# Altium PCB Backplane_Breakout_Adapter.PcbDoc
Units mil, origin at the board's own origin, x right, y up, seen from the top; angles counter-clockwise.
Board outline 4000 x 4000 mil, 2 copper layers (Top Layer, Bottom Layer); 50 components, 57 nets, 309 pads, 193 vias.
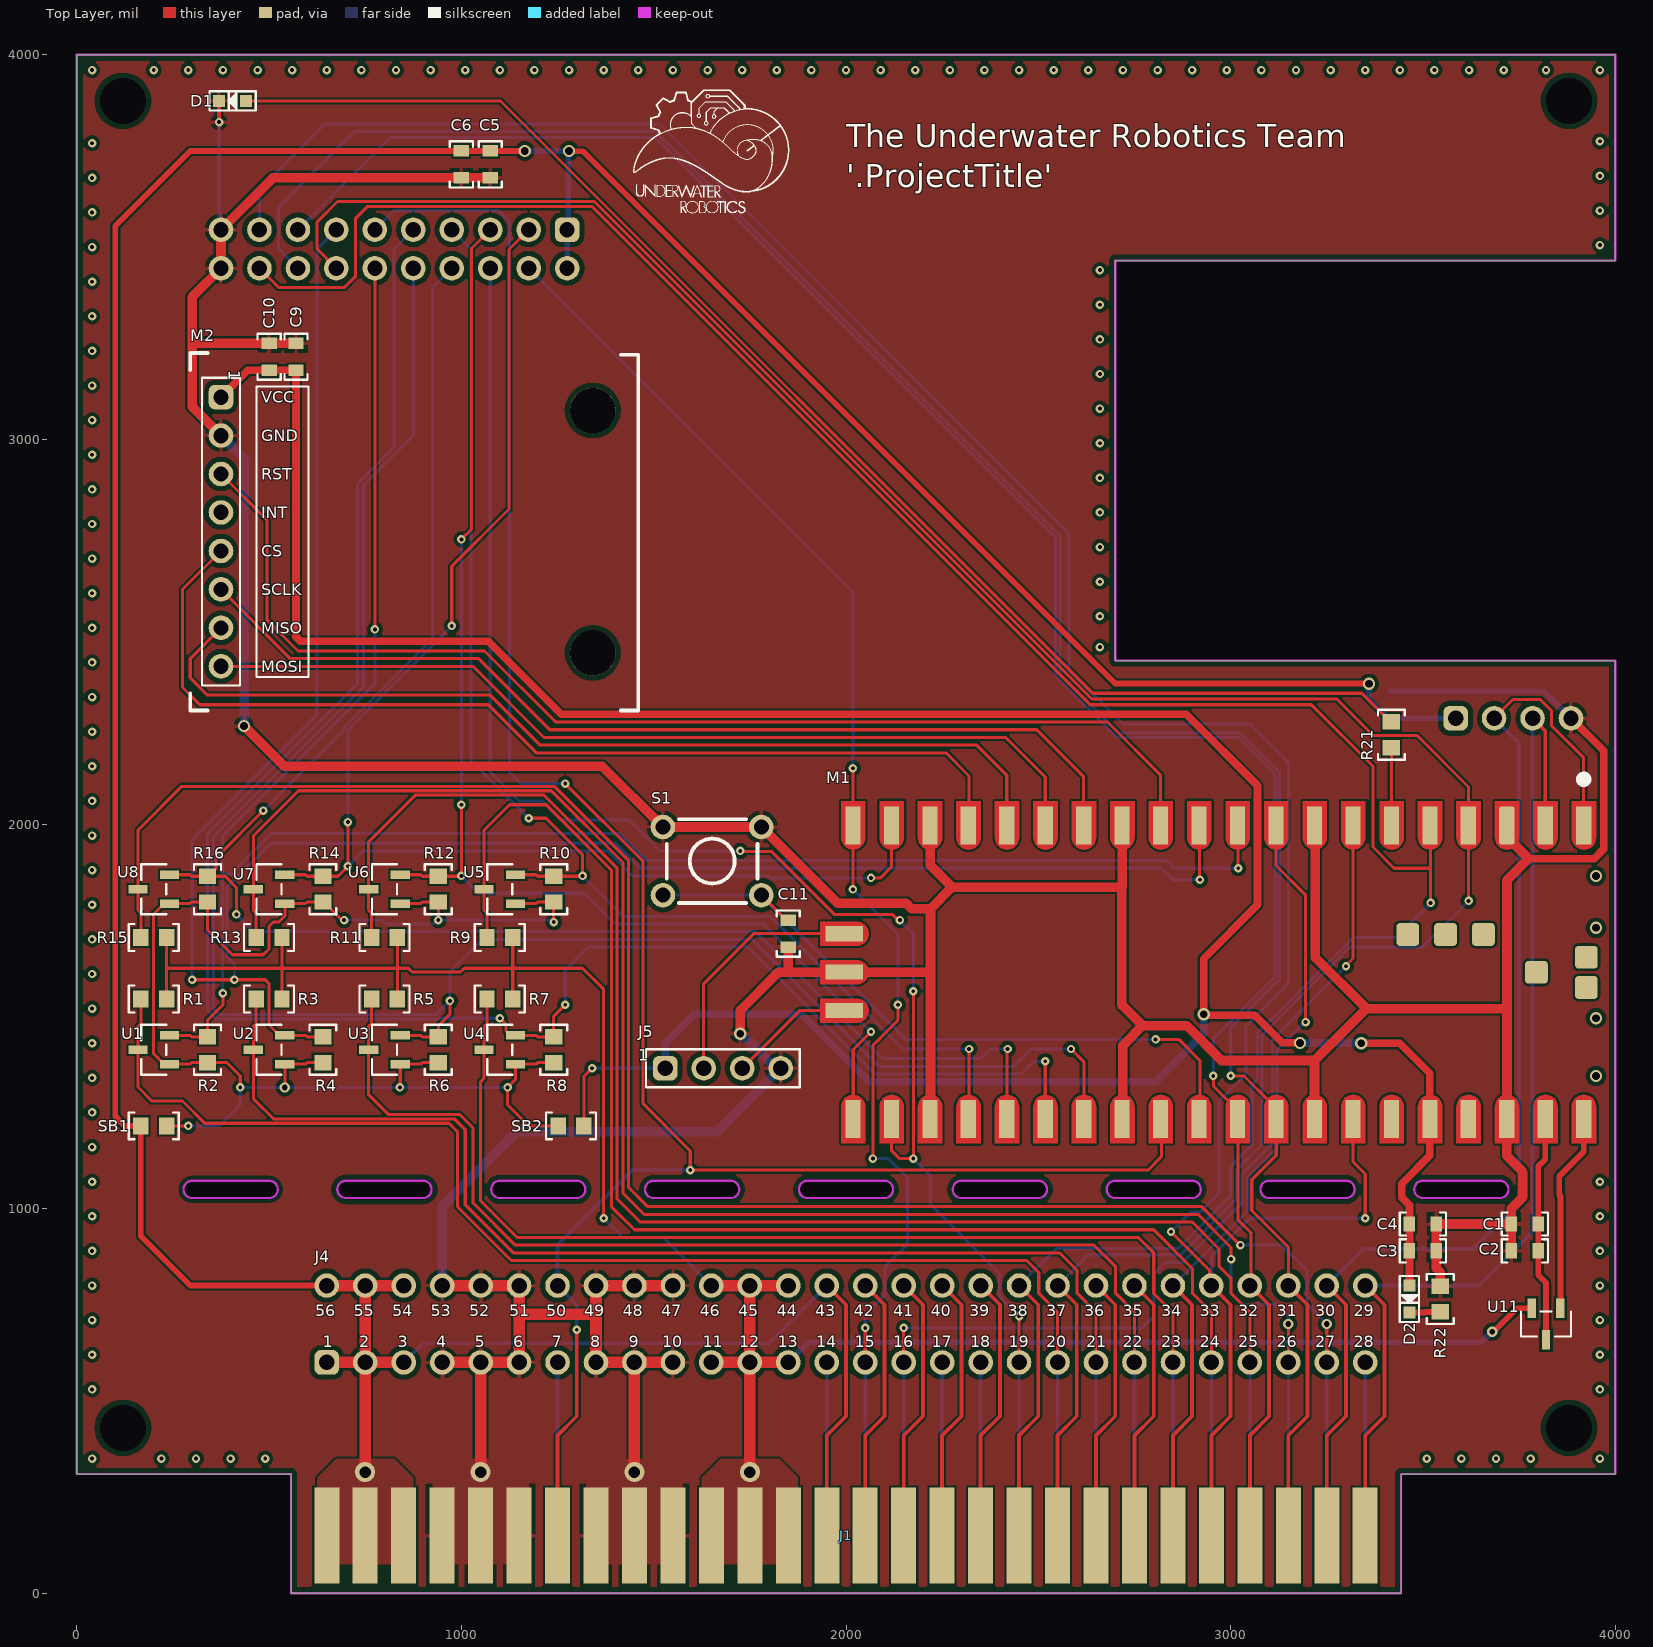
[diagram p0: Top Layer view]
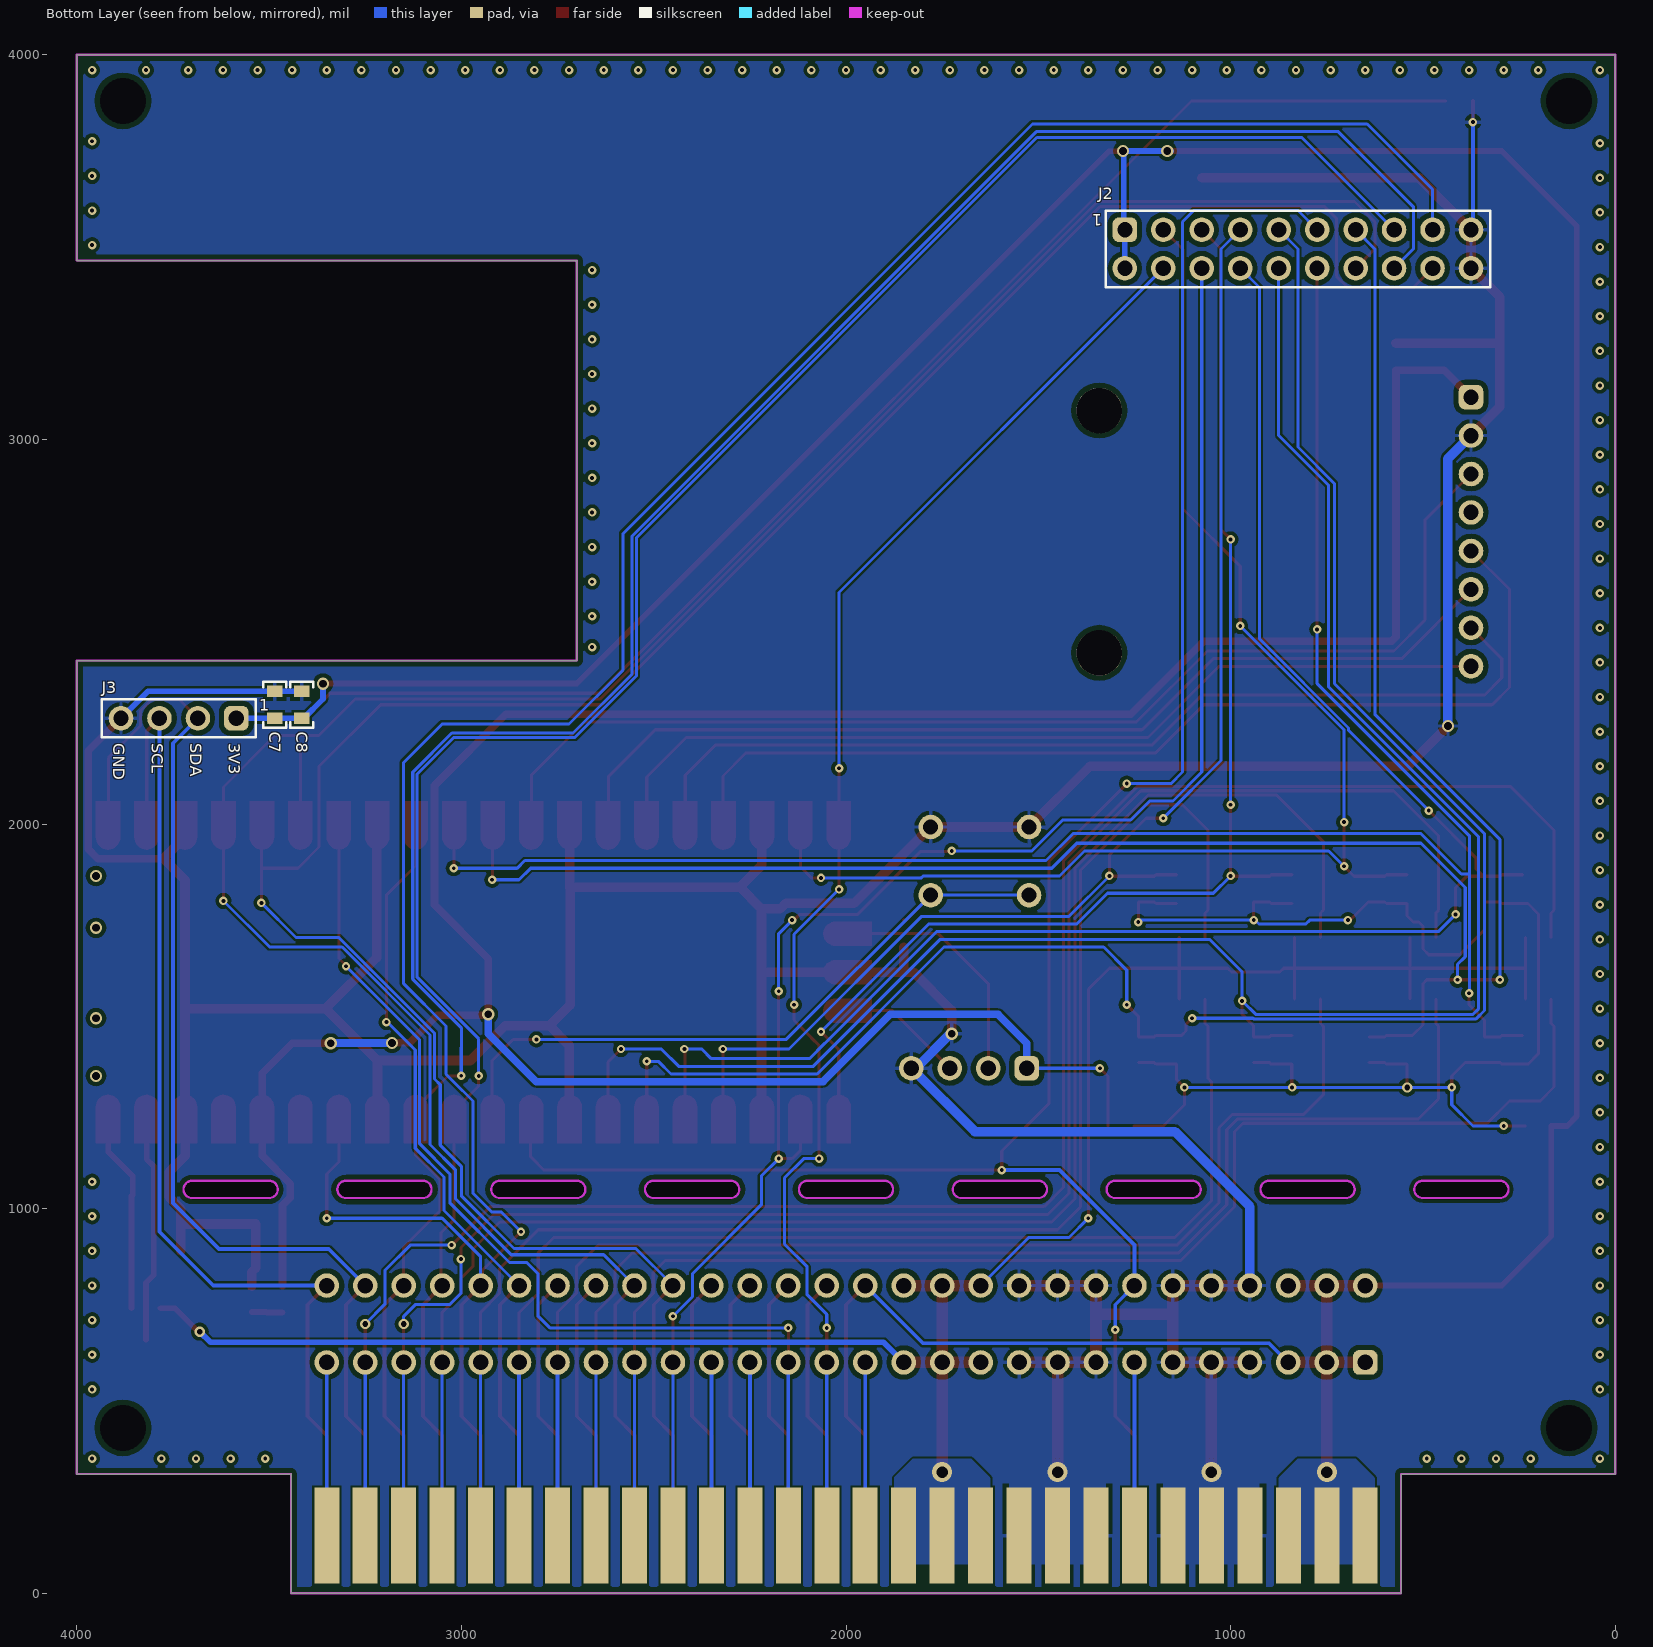
[diagram p1: Bottom Layer view, seen from below]
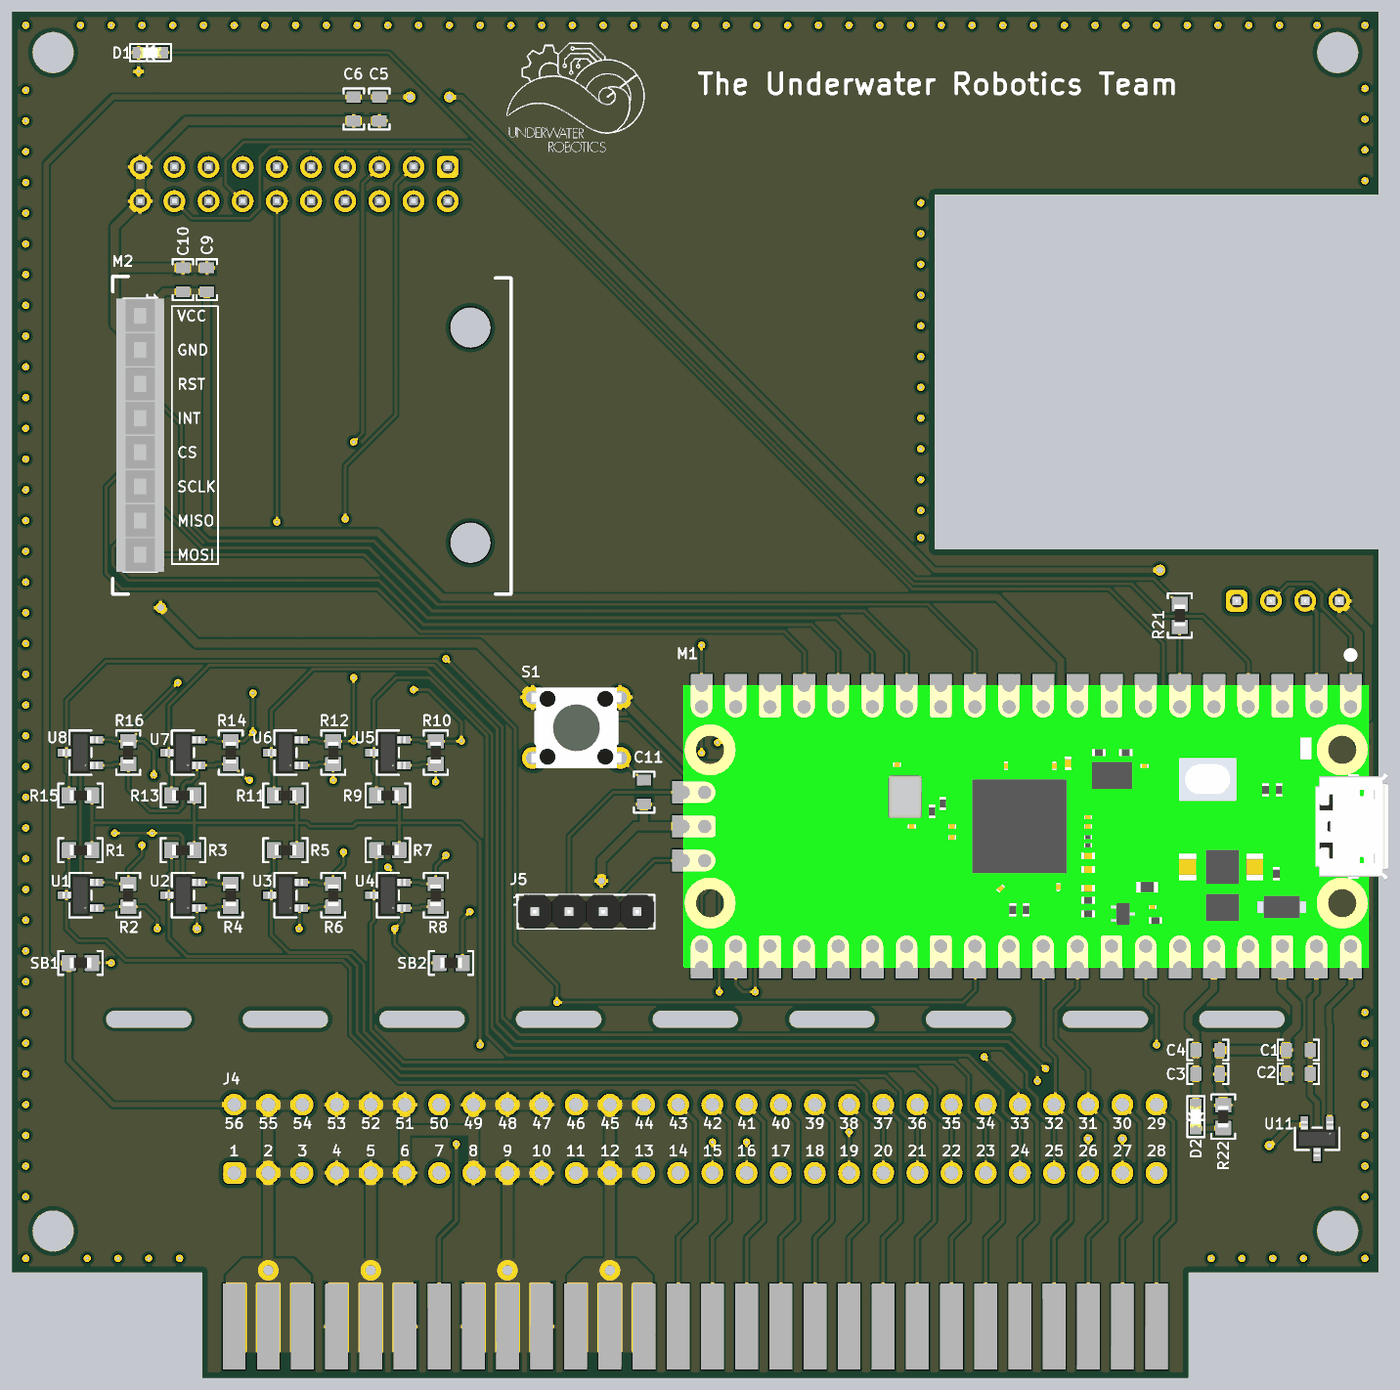
[diagram p2: 3D render of the assembled board from above, using the file's embedded part models]
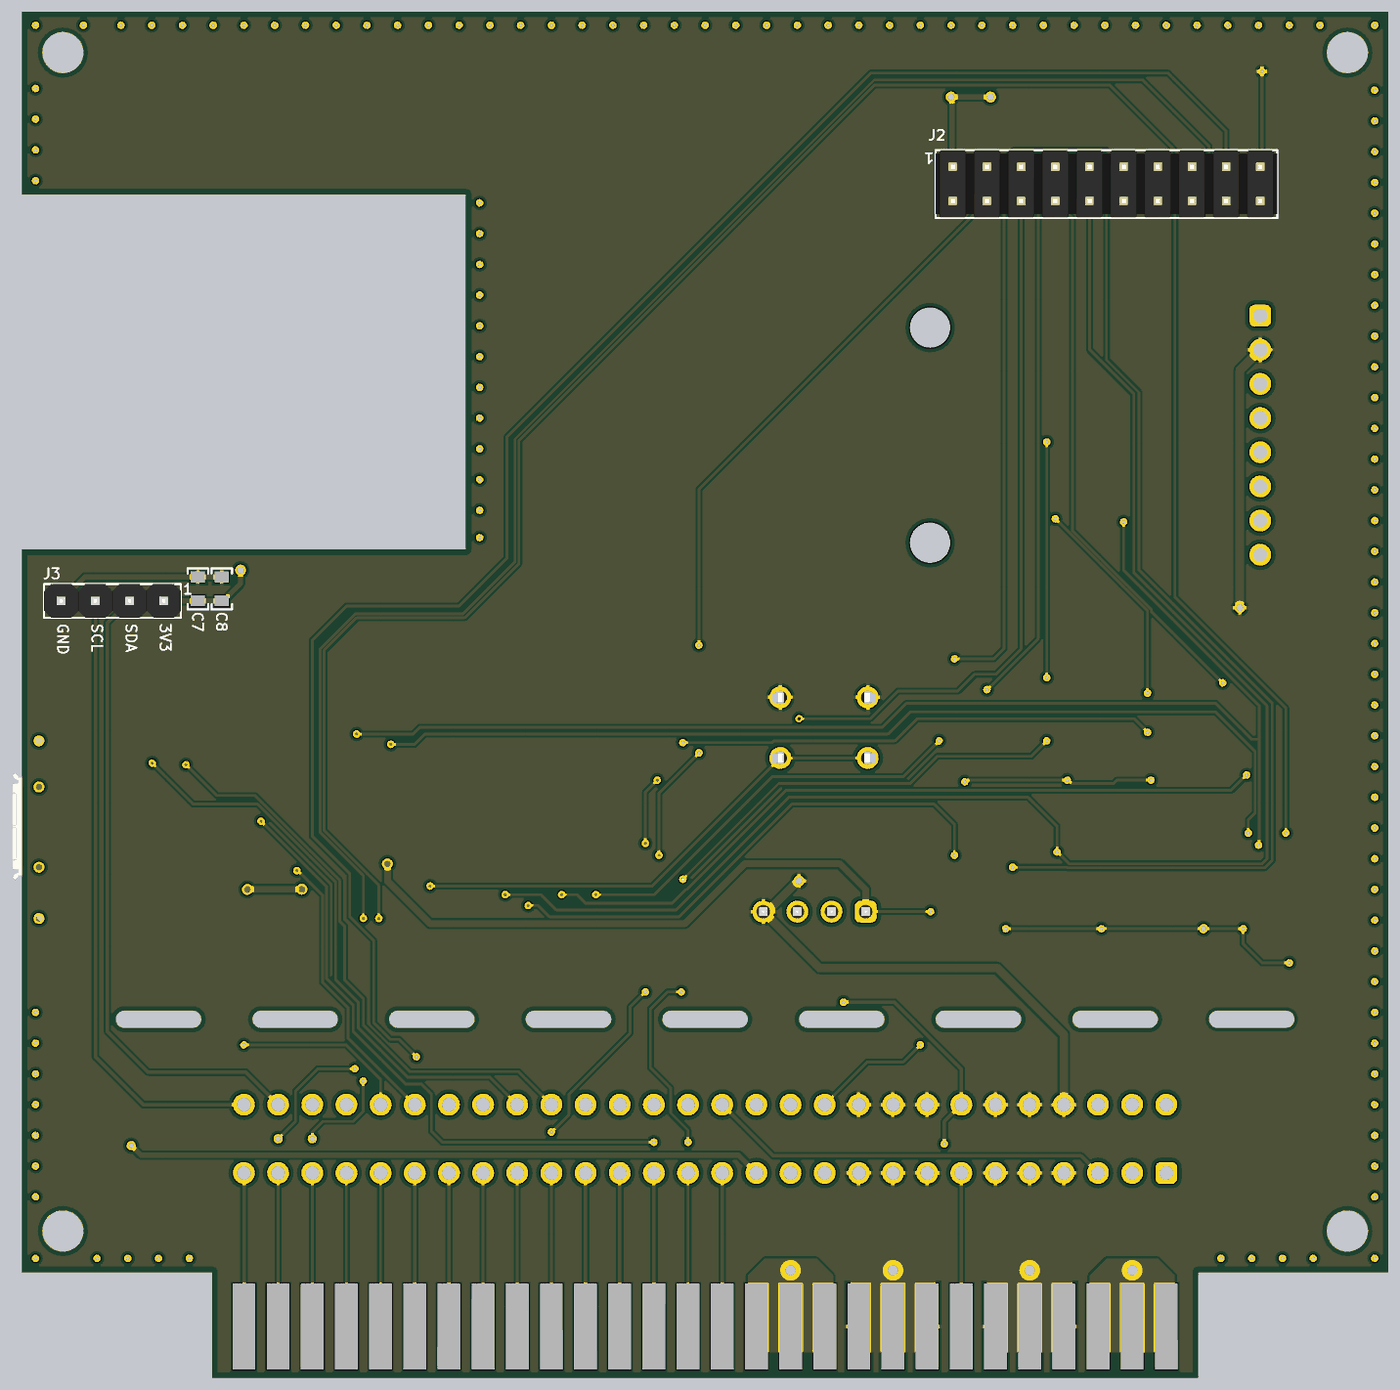
[diagram p3: 3D render of the assembled board from below, using the file's embedded part models]

## Layer stack, top to bottom
Top Solder: solder mask 0.4, Solder Resist, Dk 3.5
Top Layer: signal copper 1.4
Dielectric 1: dielectric 12.6, FR-4, Dk 4.8
Bottom Layer: signal copper 1.4
Bottom Solder: solder mask 0.4, Solder Resist, Dk 3.5

## Board outline
557,0 557,310 0,310 0,4000 4000,4000 4000,3465 2700,3465 2700,2425 4000,2425 4000,310 3443,310 3443,0

## Design rules (kind name [scope] priority, off if disabled: settings)
AcuteAngle [All] p1: minimum=8.75000000000000E+0001 checktracksonly=FALSE
BoardOutlineClearance [All] p1: gap=16 ignorepadtopadclearanceinfootprint=FALSE
Clearance "Clearance JLCPCB" [All] p1: gap=6 ignorepadtopadclearanceinfootprint=FALSE except(3.5: Arc-Arc Arc-Track Track-Track; 5: Arc-SMDPad Track-SMDPad SMDPad-SMDPad; 10: Arc-Via Arc-Hole Track-Via Track-Hole Via-Via Via-Fill Via-Poly Via-Region Fill-Hole Poly-Hole Region-Hole; 12.99: Arc-THPad Track-THPad; 13: THPad-Fill THPad-Poly THPad-Region; 20: THPad-THPad)
ComponentOrientations [All] p1: allowedrotations=32
DiffPairsRouting "USB 2.0" [InDifferentialPairClass('USB 2.0')] p1: maxlimit=4 minlimit=4 mostfreqgap=4 toplayer_minwidth=9 toplayer_maxwidth=9 toplayer_prefwidth=9 bottomlayer_minwidth=9 bottomlayer_maxwidth=9 bottomlayer_prefwidth=9 impedanceprofiledriven=TRUE impedanceprofileid={B279FAB8-9179-4BDF-8125-EF1A8961339F} maxuncoupledlength=500
DiffPairsRouting [All] p2: maxlimit=10 minlimit=10 mostfreqgap=10 toplayer_minwidth=15 toplayer_maxwidth=15 toplayer_prefwidth=15 bottomlayer_minwidth=15 bottomlayer_maxwidth=15 bottomlayer_prefwidth=15 maxuncoupledlength=500
FanoutControl Fanout_Default [All] p5: bgadir=Out bgaviamode=Centered fanoutstyle=Auto fanoutdirection=OutOnly viagrid=1 // Fanout_Default (Default Rule)
HoleSize "HoleSize JLCPCB" [All] p1: absolutevalues=TRUE maxlimit=245 minlimit=8 maxpercent=80.000 minpercent=20.000
HoleToHoleClearance "HoleToHoleClearance JLCPCB" [All] p1: gap=20 allowstackedmicrovias=TRUE
MinimumAnnularRing "MinimumAnnularRing JLCPCB" [All] p1: minimumring=6
MinimumSolderMaskSliver [All] p1 off: minsoldermaskwidth=10
PasteMaskExpansion [All] p1: expansion=1
PolygonConnect EdgeConnect [(IsNamedPolygon('PolygonDirect'))] p1: connectstyle=Direct reliefconductorwidth=10 reliefentries=4 polygonreliefangle="90 Angle" airgapwidth=10
PolygonConnect [All] p2: connectstyle=Relief reliefconductorwidth=10 reliefentries=4 polygonreliefangle="90 Angle" airgapwidth=10
RoutingVias "RoutingVias JLCPCB" [All] p1: holewidth=10 width=22 viastyle="Through Hole" minholewidth=8 minwidth=20 maxholewidth=28 maxwidth=40
SMDEntry [All] p1: side=TRUE corner=TRUE anyangle=FALSE
SMDToCorner [All] p1: distance=0
SMDToPlane [All] p1: distance=0
SilkToSilkClearance [All] p1: silktosilkclearance=1
SilkToSolderMaskClearance "SilkToSolderMaskClearance JLCPCB" [IsPad] p1: minsilkscreentomaskgap=6 clearancetoexposedcopper=TRUE
SolderMaskExpansion [All] p1: expansion=4 istentingtop=FALSE
UnRoutedNet [All] p1: checkbadconnections=TRUE
Width "Width JLCPCB 1oz" [All] p1: maxlimit=100 minlimit=5 preferedwidth=8 minimp=50.000000 maximp=50.000000 favimp=50.000000
21 further rules are at their usual default settings.

## Classes and differential pairs
component class Backplane_Breakout_Adapter_Pico: C1 C2 C3 C4 C9 C10 C11 D1 D2 J5 M1 M2 R21 R22 S1 U11
component class Backplane_Breakout_Adapter_Connectors: C5 C6 C7 C8 J1 J2 J3 J4 R1 R2 R3 R4 R5 R6 R7 R8 R9 R10 R11 R12 R13 R14 R15 R16 SB1 SB2 U1 U2 U3 U4 U5 U6 U7 U8

## Components (designator, comment, footprint, x,y, rotation, side; value= is the part's Value field where it differs from the comment)
C1 "1uF Ceramic 16V" CAPACITOR_0603 3765,960 r180 top value=1uF
C2 "10uF Ceramic 6.3V" CAPACITOR_0603 3765,890 r180 top
C3 "1uF Ceramic 16V" CAPACITOR_0603 3500,890 r0 top value=1uF
C4 "10uF Ceramic 6.3V" CAPACITOR_0603 3500,960 r0 top
C5 "100nF Ceramic 6.3V" CAPACITOR_0603 1075,3715 r270 top value=0.1uF
C6 "1uF Ceramic 16V" CAPACITOR_0603 1000,3715 r270 top value=1uF
C7 "100nF Ceramic 6.3V" CAPACITOR_0603 3485,2310 r90 bottom value=0.1uF
C8 "1uF Ceramic 16V" CAPACITOR_0603 3415,2310 r90 bottom value=1uF
C9 "1uF Ceramic 16V" CAPACITOR_0603 570,3215 r90 top value=1uF
C10 "100nF Ceramic 6.3V" CAPACITOR_0603 500,3215 r90 top value=0.1uF
C11 "10nF Ceramic 6.3V" CAPACITOR_0603 1850,1715 r270 top value=0.01uF
D1 "150060RS75000" LED_0603 405,3880 r180 top
D2 "150060GS75000" LED_0603 3465,765 r270 top
J1 "Backplane Connector" BACKPLANE_EDGE_CONN 650,150 r0 top locked
J2 "RP2040 GPIO Header" HEADER_MIRRORED_2x10PIN_2.54MM 1275,3545 r0 bottom locked
J3 "CONN HEADER VERT 4POS 2.54MM" HEADER_MIRRORED_4PIN_2.54MM 3585,2275 r180 bottom locked
J4 "Backplane Breakout Pins" HEADER_2X28PIN_2.54MM 650,600 r0 top locked
J5 "CONN HEADER VERT 4POS 2.54MM" HEADER_4PIN_2.54MM 1530,1365 r0 top locked
M1 "RPI-PICO" RPI-PICO-MOD 2956.8,1614.76 r270 top locked
M2 "W5x00 Breakout Board" W5500IO-P 375,3110 r270 top locked
R1 "10k Ohm 5% 1/10W" RESISTOR_0603 200,1545 r180 top
R2 "10k Ohm 5% 1/10W" RESISTOR_0603 340,1413.08 r270 top
R3 "10k Ohm 5% 1/10W" RESISTOR_0603 500,1545 r180 top
R4 "10k Ohm 5% 1/10W" RESISTOR_0603 640,1413.08 r270 top
R5 "10k Ohm 5% 1/10W" RESISTOR_0603 800,1545 r180 top
R6 "10k Ohm 5% 1/10W" RESISTOR_0603 940,1413.08 r270 top
R7 "10k Ohm 5% 1/10W" RESISTOR_0603 1100,1545 r180 top
R8 "10k Ohm 5% 1/10W" RESISTOR_0603 1240,1413.08 r270 top
R9 "10k Ohm 5% 1/10W" RESISTOR_0603 1100,1705 r180 top
R10 "10k Ohm 5% 1/10W" RESISTOR_0603 1240,1830.58 r270 top
R11 "10k Ohm 5% 1/10W" RESISTOR_0603 800,1705 r180 top
R12 "10k Ohm 5% 1/10W" RESISTOR_0603 940,1830.58 r270 top
R13 "10k Ohm 5% 1/10W" RESISTOR_0603 500,1705 r180 top
R14 "10k Ohm 5% 1/10W" RESISTOR_0603 640,1830.58 r270 top
R15 "10k Ohm 5% 1/10W" RESISTOR_0603 200,1705 r180 top
R16 "10k Ohm 5% 1/10W" RESISTOR_0603 340,1830.58 r270 top
R21 "62 Ohm 1% 1/4W" RESISTOR_0603 3418.02,2231.98 r270 top
R22 "27 Ohm 5% 1/8W" RESISTOR_0603 3545,765 r270 top
S1 "SPST Tactile Switch" TactileSwitch 1780,1815 r180 top locked
SB1 "0 Ohm Jumper No Fit" RESISTOR_0603 200,1215 r180 top
SB2 "0 Ohm Jumper No Fit" RESISTOR_0603 1285,1215 r180 top
U1 "AO3404A" SOT-23-3 200,1413.08 r90 top
U2 "AO3404A" SOT-23-3 500,1413.08 r90 top
U3 "AO3404A" SOT-23-3 800,1413.08 r90 top
U4 "AO3404A" SOT-23-3 1100,1413.08 r90 top
U5 "AO3404A" SOT-23-3 1100,1830.58 r90 top
U6 "AO3404A" SOT-23-3 800,1830.58 r90 top
U7 "AO3404A" SOT-23-3 500,1830.58 r90 top
U8 "AO3404A" SOT-23-3 200,1830.58 r90 top
U11 "MOSFET P-CHANNEL 20V 4.7A SOT23" SOT-23-3 3820,700 r180 top

## Footprints (in the part's own frame and the unit in brackets; to place one, negate y for a bottom-side part, rotate by r counter-clockwise, add the part's x,y. Pads: shape width x height; smd on the part's side, far side on the other; paste and mask are expansions set on the pad)
BACKPLANE_EDGE_CONN [mil]
  rect 65x250 smd far side: 1(0,0) 2(100,0) 3(200,0) 4(300,0) 5(400,0) 6(500,0) 7(600,0) 8(700,0) 9(800,0) 10(900,0) 11(1000,0) 12(1100,0) 13(1200,0) 14(1300,0) 15(1400,0) 16(1500,0) 17(1600,0) 18(1700,0) 19(1800,0) 20(1900,0) 21(2000,0) 22(2100,0) 23(2200,0) 24(2300,0) 25(2400,0) 26(2500,0) 27(2600,0) 28(2700,0)
  rect 65x250 smd: 29(2700,0) 30(2600,0) 31(2500,0) 32(2400,0) 33(2300,0) 34(2200,0) 35(2100,0) 36(2000,0) 37(1900,0) 38(1800,0) 39(1700,0) 40(1600,0) 41(1500,0) 42(1400,0) 43(1300,0) 44(1200,0) 45(1100,0) 46(1000,0) 47(900,0) 48(800,0) 49(700,0) 50(600,0) 51(500,0) 52(400,0) 53(300,0) 54(200,0) 55(100,0) 56(0,0)
CAPACITOR_0603 [mil] "CAPACITOR 0603"
  rect 30x40 smd: 1(-35,0) 2(35,0)
  silkscreen extent -60,-30 60,30, body extent -31,-16 32,16, height 31
HEADER_2X28PIN_2.54MM [mm]
  rrect50% 1.62x1.62 hole 1.02: 1(0,0)
  round 1.62 hole 1.02: 2(2.54,0) 3(5.08,0) 4(7.62,0) 5(10.16,0) 6(12.7,0) 7(15.24,0) 8(17.78,0) 9(20.32,0) 10(22.86,0) 11(25.4,0) 12(27.94,0) 13(30.48,0) 14(33.02,0) 15(35.56,0) 16(38.1,0) 17(40.64,0) 18(43.18,0) 19(45.72,0) 20(48.26,0) 21(50.8,0) 22(53.34,0) 23(55.88,0) 24(58.42,0) 25(60.96,0) 26(63.5,0) 27(66.04,0) 28(68.58,0) 29(68.58,5.08) 30(66.04,5.08) 31(63.5,5.08) 32(60.96,5.08) 33(58.42,5.08) 34(55.88,5.08) 35(53.34,5.08) 36(50.8,5.08) 37(48.26,5.08) 38(45.72,5.08) 39(43.18,5.08) 40(40.64,5.08) 41(38.1,5.08) 42(35.56,5.08) 43(33.02,5.08) 44(30.48,5.08) 45(27.94,5.08) 46(25.4,5.08) 47(22.86,5.08) 48(20.32,5.08) 49(17.78,5.08) 50(15.24,5.08) 51(12.7,5.08) 52(10.16,5.08) 53(7.62,5.08) 54(5.08,5.08) 55(2.54,5.08) 56(0,5.08)
HEADER_4PIN_2.54MM [mm]
  rrect50% 1.62x1.62 hole 1.02: 1(0,0)
  round 1.62 hole 1.02: 2(2.54,0) 3(5.08,0) 4(7.62,0)
  silkscreen extent -1.27,-1.25 8.89,1.25, body extent -1.27,-1.27 8.89,1.27, height 10.48
HEADER_MIRRORED_2x10PIN_2.54MM [mm]
  rrect50% 1.62x1.62 hole 1: 1(0,0)
  round 1.62 hole 1: 2(0,2.54) 3(-2.54,0) 4(-2.54,2.54) 5(-5.08,0) 6(-5.08,2.54) 7(-7.62,0) 8(-7.62,2.54) 9(-10.16,0) 10(-10.16,2.54) 11(-12.7,0) 12(-12.7,2.54)
  round 1.62 hole 1.02: 13(-15.24,0) 14(-15.24,2.54) 15(-17.78,0) 16(-17.78,2.54) 17(-20.32,0) 18(-20.32,2.54) 19(-22.86,0) 20(-22.86,2.54)
  silkscreen extent -24.13,-1.25 1.27,3.79, body extent -24.13,-1.25 1.27,3.75, height 7.01
HEADER_MIRRORED_4PIN_2.54MM [mm]
  rrect50% 1.62x1.62 hole 1.02: 1(0,0)
  round 1.62 hole 1.02: 2(-2.54,0) 3(-5.08,0) 4(-7.62,0)
  silkscreen extent -8.89,-1.25 1.27,1.25, body extent -8.89,-1.27 1.27,1.27, height 10.48
LED_0603 [mil] "LED 0603"
  rect 32x32 smd: 1(-35,0) 2(35,0)
  silkscreen extent -60,-25 60,25, body extent -31,-16 32,16, height 28
RESISTOR_0603 [mil] "Resistor 0603"
  rect 40x45 smd: 1(-33.5,0) 2(33.5,0)
  silkscreen extent -65,-35 65,35, body extent -31,-16 32,16, height 16
RPI-PICO-MOD [mm] "RASPBERRY PI PICO RP2040 BOARD"
  rect 2.5x1 smd mask+0.102: 1(-9.69,24.415) 2(-9.69,21.875) 4(-9.69,16.795) 5(-9.69,14.255) 6(-9.69,11.715) 7(-9.69,9.175) 8(-9.69,6.635) 9(-9.69,4.095) 10(-9.69,1.555) 11(-9.69,-0.985) 12(-9.69,-3.525) 13(-9.69,-6.065) 14(-9.69,-8.605) 15(-9.69,-11.145) 16(-9.69,-13.685) 17(-9.69,-16.225) 18(-9.69,-18.765) 19(-9.69,-21.305) 20(-9.69,-23.845)
  rrect25% 2.5x1 smd mask+0.102: 3(-9.69,19.335)
  rect 2.5x1 smd: 21(9.69,-23.845) 22(9.69,-21.305) 23(9.69,-18.765) 24(9.69,-16.225) 25(9.69,-13.685) 26(9.69,-11.145) 27(9.69,-8.605) 28(9.69,-6.065) 29(9.69,-3.525) 30(9.69,-0.985) 31(9.69,1.555) 32(9.69,4.095) 33(9.69,6.635) 34(9.69,9.175) 35(9.69,11.715) 36(9.69,14.255) 37(9.69,16.795) 38(9.69,19.335) 39(9.69,21.875) 40(9.69,24.415)
  rect 1x2.5 smd: 41(-2.54,-24.415) 42(0,-24.415) 43(2.54,-24.415)
  rrect30% 1.5x1.5 smd: 44(0.01,21.292) 45(1.01,24.592) 46(-0.99,24.592) 47(-2.49,17.792) 48(-2.49,15.292) 49(-2.49,12.792)
  Top Layer region: -1.74,-25.999 -3.34,-25.999 -3.34,-23.599 -3.34,-23.599 -3.261,-23.252 -3.039,-22.974 -2.718,-22.819 -2.362,-22.819 -2.041,-22.974 -1.819,-23.252 -1.74,-23.599 -1.74,-23.599
  Top Layer region: 0.8,-25.999 -0.8,-25.999 -0.8,-23.599 -0.8,-23.599 -0.721,-23.252 -0.499,-22.974 -0.178,-22.819 0.178,-22.819 0.499,-22.974 0.721,-23.252 0.8,-23.599 0.8,-23.599
  Top Layer region: 3.34,-25.999 1.74,-25.999 1.74,-23.599 1.74,-23.599 1.819,-23.252 2.041,-22.974 2.362,-22.819 2.718,-22.819 3.039,-22.974 3.261,-23.252 3.34,-23.599 3.34,-23.599
  Top Layer region: -11.292,-24.629 -11.292,-23.029 -8.892,-23.029 -8.892,-23.029 -8.545,-23.108 -8.267,-23.33 -8.112,-23.651 -8.112,-24.007 -8.267,-24.328 -8.545,-24.55 -8.892,-24.629 -8.892,-24.629
  Top Layer region: -11.292,-22.089 -11.292,-20.489 -8.892,-20.489 -8.892,-20.489 -8.545,-20.568 -8.267,-20.79 -8.112,-21.111 -8.112,-21.467 -8.267,-21.788 -8.545,-22.01 -8.892,-22.089 -8.892,-22.089
  Top Layer region: -11.292,-19.549 -11.292,-17.949 -8.892,-17.949 -8.892,-17.949 -8.545,-18.028 -8.267,-18.25 -8.112,-18.571 -8.112,-18.927 -8.267,-19.248 -8.545,-19.47 -8.892,-19.549 -8.892,-19.549
  Top Layer region: -11.292,-17.009 -11.292,-15.409 -8.892,-15.409 -8.892,-15.409 -8.545,-15.488 -8.267,-15.71 -8.112,-16.031 -8.112,-16.387 -8.267,-16.708 -8.545,-16.93 -8.892,-17.009 -8.892,-17.009
  Top Layer region: -11.292,-14.469 -11.292,-12.869 -8.892,-12.869 -8.892,-12.869 -8.545,-12.948 -8.267,-13.17 -8.112,-13.491 -8.112,-13.847 -8.267,-14.168 -8.545,-14.39 -8.892,-14.469 -8.892,-14.469
  Top Layer region: -11.292,-11.929 -11.292,-10.329 -8.892,-10.329 -8.892,-10.329 -8.545,-10.408 -8.267,-10.63 -8.112,-10.951 -8.112,-11.307 -8.267,-11.628 -8.545,-11.85 -8.892,-11.929 -8.892,-11.929
  Top Layer region: -11.292,-9.389 -11.292,-7.789 -8.892,-7.789 -8.892,-7.789 -8.545,-7.868 -8.267,-8.09 -8.112,-8.411 -8.112,-8.767 -8.267,-9.088 -8.545,-9.31 -8.892,-9.389 -8.892,-9.389
  Top Layer region: -11.292,-6.849 -11.292,-5.249 -8.892,-5.249 -8.892,-5.249 -8.545,-5.328 -8.267,-5.55 -8.112,-5.871 -8.112,-6.227 -8.267,-6.548 -8.545,-6.77 -8.892,-6.849 -8.892,-6.849
  Top Layer region: -11.292,-4.309 -11.292,-2.709 -8.892,-2.709 -8.892,-2.709 -8.545,-2.788 -8.267,-3.01 -8.112,-3.331 -8.112,-3.687 -8.267,-4.008 -8.545,-4.23 -8.892,-4.309 -8.892,-4.309
  Top Layer region: -11.292,-1.769 -11.292,-0.169 -8.892,-0.169 -8.892,-0.169 -8.545,-0.248 -8.267,-0.47 -8.112,-0.791 -8.112,-1.147 -8.267,-1.468 -8.545,-1.69 -8.892,-1.769 -8.892,-1.769
  Top Layer region: -11.292,0.771 -11.292,2.371 -8.892,2.371 -8.892,2.371 -8.545,2.292 -8.267,2.07 -8.112,1.749 -8.112,1.393 -8.267,1.072 -8.545,0.85 -8.892,0.771 -8.892,0.771
  Top Layer region: -11.292,3.311 -11.292,4.911 -8.892,4.911 -8.892,4.911 -8.545,4.832 -8.267,4.61 -8.112,4.289 -8.112,3.933 -8.267,3.612 -8.545,3.39 -8.892,3.311 -8.892,3.311
  Top Layer region: -11.292,5.851 -11.292,7.451 -8.892,7.451 -8.892,7.451 -8.545,7.372 -8.267,7.15 -8.112,6.829 -8.112,6.473 -8.267,6.152 -8.545,5.93 -8.892,5.851 -8.892,5.851
  Top Layer region: -11.292,8.391 -11.292,9.991 -8.892,9.991 -8.892,9.991 -8.545,9.912 -8.267,9.69 -8.112,9.369 -8.112,9.013 -8.267,8.692 -8.545,8.47 -8.892,8.391 -8.892,8.391
  Top Layer region: -11.292,10.931 -11.292,12.531 -8.892,12.531 -8.892,12.531 -8.545,12.452 -8.267,12.23 -8.112,11.909 -8.112,11.553 -8.267,11.232 -8.545,11.01 -8.892,10.931 -8.892,10.931
  Top Layer region: -11.292,13.471 -11.292,15.071 -8.892,15.071 -8.892,15.071 -8.545,14.992 -8.267,14.77 -8.112,14.449 -8.112,14.093 -8.267,13.772 -8.545,13.55 -8.892,13.471 -8.892,13.471
  Top Layer region: -11.292,16.011 -11.292,17.611 -8.892,17.611 -8.892,17.611 -8.545,17.532 -8.267,17.31 -8.112,16.989 -8.112,16.633 -8.267,16.312 -8.545,16.09 -8.892,16.011 -8.892,16.011
  Top Layer region: -11.292,18.551 -11.292,20.151 -8.892,20.151 -8.892,20.151 -8.545,20.072 -8.267,19.85 -8.112,19.529 -8.112,19.173 -8.267,18.852 -8.545,18.63 -8.892,18.551 -8.892,18.551
  Top Layer region: -11.292,21.091 -11.292,22.691 -8.892,22.691 -8.892,22.691 -8.545,22.612 -8.267,22.39 -8.112,22.069 -8.112,21.713 -8.267,21.392 -8.545,21.17 -8.892,21.091 -8.892,21.091
  Top Layer region: -11.292,23.631 -11.292,25.231 -8.892,25.231 -8.892,25.231 -8.545,25.152 -8.267,24.93 -8.112,24.609 -8.112,24.253 -8.267,23.932 -8.545,23.71 -8.892,23.631 -8.892,23.631
  Top Layer region: 11.292,23.631 11.292,25.231 8.892,25.231 8.892,25.231 8.545,25.152 8.267,24.93 8.112,24.609 8.112,24.253 8.267,23.932 8.545,23.71 8.892,23.631 8.892,23.631
  Top Layer region: 11.292,21.091 11.292,22.691 8.892,22.691 8.892,22.691 8.545,22.612 8.267,22.39 8.112,22.069 8.112,21.713 8.267,21.392 8.545,21.17 8.892,21.091 8.892,21.091
  Top Layer region: 11.292,18.551 11.292,20.151 8.892,20.151 8.892,20.151 8.545,20.072 8.267,19.85 8.112,19.529 8.112,19.173 8.267,18.852 8.545,18.63 8.892,18.551 8.892,18.551
  Top Layer region: 11.292,16.011 11.292,17.611 8.892,17.611 8.892,17.611 8.545,17.532 8.267,17.31 8.112,16.989 8.112,16.633 8.267,16.312 8.545,16.09 8.892,16.011 8.892,16.011
  Top Layer region: 11.292,13.471 11.292,15.071 8.892,15.071 8.892,15.071 8.545,14.992 8.267,14.77 8.112,14.449 8.112,14.093 8.267,13.772 8.545,13.55 8.892,13.471 8.892,13.471
  Top Layer region: 11.292,10.931 11.292,12.531 8.892,12.531 8.892,12.531 8.545,12.452 8.267,12.23 8.112,11.909 8.112,11.553 8.267,11.232 8.545,11.01 8.892,10.931 8.892,10.931
  Top Layer region: 11.292,8.391 11.292,9.991 8.892,9.991 8.892,9.991 8.545,9.912 8.267,9.69 8.112,9.369 8.112,9.013 8.267,8.692 8.545,8.47 8.892,8.391 8.892,8.391
  Top Layer region: 11.292,5.851 11.292,7.451 8.892,7.451 8.892,7.451 8.545,7.372 8.267,7.15 8.112,6.829 8.112,6.473 8.267,6.152 8.545,5.93 8.892,5.851 8.892,5.851
  Top Layer region: 11.292,3.311 11.292,4.911 8.892,4.911 8.892,4.911 8.545,4.832 8.267,4.61 8.112,4.289 8.112,3.933 8.267,3.612 8.545,3.39 8.892,3.311 8.892,3.311
  Top Layer region: 11.292,0.771 11.292,2.371 8.892,2.371 8.892,2.371 8.545,2.292 8.267,2.07 8.112,1.749 8.112,1.393 8.267,1.072 8.545,0.85 8.892,0.771 8.892,0.771
  Top Layer region: 11.292,-1.769 11.292,-0.169 8.892,-0.169 8.892,-0.169 8.545,-0.248 8.267,-0.47 8.112,-0.791 8.112,-1.147 8.267,-1.468 8.545,-1.69 8.892,-1.769 8.892,-1.769
  Top Layer region: 11.292,-4.309 11.292,-2.709 8.892,-2.709 8.892,-2.709 8.545,-2.788 8.267,-3.01 8.112,-3.331 8.112,-3.687 8.267,-4.008 8.545,-4.23 8.892,-4.309 8.892,-4.309
  Top Layer region: 11.292,-6.849 11.292,-5.249 8.892,-5.249 8.892,-5.249 8.545,-5.328 8.267,-5.55 8.112,-5.871 8.112,-6.227 8.267,-6.548 8.545,-6.77 8.892,-6.849 8.892,-6.849
  Top Layer region: 11.292,-9.389 11.292,-7.789 8.892,-7.789 8.892,-7.789 8.545,-7.868 8.267,-8.09 8.112,-8.411 8.112,-8.767 8.267,-9.088 8.545,-9.31 8.892,-9.389 8.892,-9.389
  Top Layer region: 11.292,-11.929 11.292,-10.329 8.892,-10.329 8.892,-10.329 8.545,-10.408 8.267,-10.63 8.112,-10.951 8.112,-11.307 8.267,-11.628 8.545,-11.85 8.892,-11.929 8.892,-11.929
  Top Layer region: 11.292,-14.469 11.292,-12.869 8.892,-12.869 8.892,-12.869 8.545,-12.948 8.267,-13.17 8.112,-13.491 8.112,-13.847 8.267,-14.168 8.545,-14.39 8.892,-14.469 8.892,-14.469
  Top Layer region: 11.292,-17.009 11.292,-15.409 8.892,-15.409 8.892,-15.409 8.545,-15.488 8.267,-15.71 8.112,-16.031 8.112,-16.387 8.267,-16.708 8.545,-16.93 8.892,-17.009 8.892,-17.009
  Top Layer region: 11.292,-19.549 11.292,-17.949 8.892,-17.949 8.892,-17.949 8.545,-18.028 8.267,-18.25 8.112,-18.571 8.112,-18.927 8.267,-19.248 8.545,-19.47 8.892,-19.549 8.892,-19.549
  Top Layer region: 11.292,-22.089 11.292,-20.489 8.892,-20.489 8.892,-20.489 8.545,-20.568 8.267,-20.79 8.112,-21.111 8.112,-21.467 8.267,-21.788 8.545,-22.01 8.892,-22.089 8.892,-22.089
  Top Layer region: 11.292,-24.629 11.292,-23.029 8.892,-23.029 8.892,-23.029 8.545,-23.108 8.267,-23.33 8.112,-23.651 8.112,-24.007 8.267,-24.328 8.545,-24.55 8.892,-24.629 8.892,-24.629
  silkscreen extent -12.99,24.16 -12.48,24.67, body extent -10.49,-25.21 10.51,27.22, height 3.69
SOT-23-3 [mil]
  rect 22x50 smd paste+0 mask+4: 1(-37.5,-41) 2(37.5,-41) 3(0,41)
  silkscreen extent -65,-33 65,33, body extent -60,-52 60,52, height 44
TactileSwitch [mm]
  round 1.62 hole 1: 1(0,0) 2(6.5,0) 3(0,-4.5) 4(6.5,-4.5)
  silkscreen extent 0.25,-5.01 6.25,0.51, body extent -0.6,-5.24 7.1,0.76, height 7.01
W5500IO-P [mm]
  rrect50% 1.62x1.62 hole 1.02: 1(0,0)
  round 1.62 hole 1.02: 2(2.54,0) 3(5.08,0) 4(7.62,0)
  round 1.62 hole 1: 5(10.16,0) 6(12.7,0) 7(15.24,0) 8(17.78,0)
  round 3 hole 3 unplated: H1(0.89,24.55) H2(16.89,24.55)
  silkscreen extent -2.92,-2.03 20.7,27.56, body extent -1.27,-1.78 19.05,1.78, height 8.65

## Part data
C1 C3 C6 C8 C9: library part CAPACITOR_1uF_0603, "Cap 1uF 16V +/-10% / Ceramic 0603", Supplier Part Number 1=399-7847-1-ND, Tolerance="+/- 10%", Voltage=16V, Made By="Flip B", Supplier 1=Digi-Key
C2 C4: library part CAPACITOR_10uF_0603, "Cap 10uF 6.3V +/-20% / Ceramic 0603", Supplier Part Number 1=1276-1119-1-ND, Tolerance="+/- 20%", Value (uF)=10, Voltage=6.3V, ComponentLink1Description=Digikey, ComponentLink1URL=https://www.digikey.com/en/products/detail/samsung-electro-mechanics/CL10A106MQ8NNNC/3886777, Made By="Flip B", Supplier 1=Digi-Key
C5 C7 C10: library part CAPACITOR_0.1uF_0603, "Cap 100nF 6.3V +/-10% / Ceramic 0603", Supplier Part Number 1=399-15351-1-ND, Tolerance="+/- 10%", Voltage=6.3V, ComponentLink1Description=Datsheet, ComponentLink1URL=https://www.mouser.com/datasheet/2/212/KEM_C1002_X7R_SMD-1102033.pdf, Made By="Flip B", Supplier 1=Digi-Key
C11: library part CAPACITOR_0.01uF_0603, "Cap 10nF 6.3V +/-20% / Ceramic 0603", Supplier Part Number 1=80-C0603C103K9R, Tolerance="+/- 10%", Voltage=6.3V, ComponentLink1Description=Datsheet, ComponentLink1URL=https://www.mouser.com/datasheet/2/212/KEM_C1002_X7R_SMD-1102033.pdf, Made By="Flip B", Supplier 1=Mouser
D1: library part LED_Red_0603, "LED Red Vf= 2V If = 0.020A / IN-S63AT5G", Color=Red, Forward Current=20mA, Forward Voltage=2V, Package=0603, Supplier Part Number 1=732-4978-1-ND, ComponentLink1Description=Datasheet, ComponentLink1URL=https://www.we-online.de/katalog/datasheet/150060GS75000.pdf, Made By="Robert Pafford", Supplier 1=Digi-Key
D2: library part LED_Green_0603_3.2V, "LED Green Vf= 3.2V If = 0.025A / 150060GS75000", Color=Green, Forward Current=25mA, Forward Voltage=3.2V, Package=0603, Supplier Part Number 1=732-4971-1-ND, ComponentLink1Description=Datasheet, ComponentLink1URL=https://www.we-online.de/katalog/datasheet/150060GS75000.pdf, Made By="Flip B", Supplier 1=Digi-Key
J1 J4: library part BACKBOARD_EDGE_CONN, "Titan Backplane Edge Connector"
J2: library part HEADER_2x10PIN_2.54MM_RP2040_GPIO, "CONN HEADER VERT 20POS 2.54MM", Supplier Part Number 1=Z8747-ND, Made By="Robert Pafford", Supplier 1=Digi-Key
J3 J5: library part HEADER_4PIN_2.54MM, Supplier Part Number 1=S1012E-04-ND, Made By="Robert Pafford", Supplier 1=Digi-Key
M1: library part RPI-PICO-MOD_SM, "RASPBERRY PI PICO RP2040 BOARD NO TEST PADS", Manufacturer="Raspberry Pi Foundation", Manufacturer Part No=SC0915, Supplier Part No=2648-SC0915CT-ND, ComponentLink1Description="Footprint Source", ComponentLink1URL=https://github.com/amgsus/RPi-Pico-Altium, Mounting Technology=SMT, Supplier=DigiKey, Supplier Link=https://www.digikey.com/en/products/detail/raspberry-pi/SC0915/13684020
M2: library part W5500IO-P, "W5x00 Breakout Board (W5500IO-P Compatible boards)", Voltage=3.3V, ComponentLink1Description="Product Webpage", ComponentLink1URL=https://maker.wiznet.io/2019/04/02/w5500io-p/, Made By="Robert Pafford"
R1 R2 R3 R4 R5 R6 R7 R8 R9 R10 R11 R12 R13 R14 R15 R16: library part RESISTOR_10K_0603, "RES 10k OHM 5% 1/10W 0603", Digikey Part Numer=CR0603-JW-104ELFTR-ND, Supplier Part Number 1=2019-RK73B1JTTD103JCT-ND, Tolerance="+/- 5%", Value  (Ohms)=10K, ComponentLink1Description=Datasheet, ComponentLink1URL=https://www.bourns.com/docs/product-datasheets/CRxxxxx.pdf, Made By="Robert Pafford", Supplier=Digikey, Supplier 1=Digi-Key, Wattage=1/8W
R21: library part RESISTOR_62_0603, "RES SMD 62 OHM 1% 1/4W 0603", Digikey Part Numer=CR0603-JW-104ELFTR-ND, Supplier Part Number 1=541-RCS060362R0FKEACT-ND, Tolerance="+/- 1%", Value  (Ohms)=62, ComponentLink1Description=Datasheet, ComponentLink1URL=https://www.bourns.com/docs/product-datasheets/CRxxxxx.pdf, Made By="Robert Pafford", Supplier=Digikey, Supplier 1=Digi-Key, Wattage=1/4W
R22: library part RESISTOR_27_0603, "RES 27 OHM 5% 1/8W 0603", Digikey Part Numer=CR0603-JW-104ELFTR-ND, Supplier Part Number 1=2019-RK73B1JTTD270JCT-ND, Tolerance="+/- 5%", Value  (Ohms)=27, ComponentLink1Description=Datasheet, ComponentLink1URL=https://www.bourns.com/docs/product-datasheets/CRxxxxx.pdf, Made By="Robert Pafford", Supplier=Digikey, Supplier 1=Digi-Key, Wattage=1/8W
S1: library part "Tactile Switch", "SWITCH TACTILE SPST-NO 0.05A 12V", Supplier Part Number 1=EG2494-ND, Made By="Robert Pafford", Supplier 1=Digi-Key
SB1 SB2: library part JUMPER_0_0603, "0 Ohm Jumper No Fit for Solder Bridge", Value  (Ohms)=0, ComponentLink1Description=Digikey, ComponentLink1URL=https://www.digikey.com/en/products/detail/koa-speer-electronics-inc/RK73B1JTTD101J/9844701, Made By="Robert Pafford"
U1 U2 U3 U4 U5 U6 U7 U8: "N-Channel 30 V 5.8A (Ta) 1.4W (Ta) Surface Mount SOT-23-3", Amp Rating="5.8 A", Package=SOT23-3L, Power Dissipation="1.4W (Ta)", Supplier Part Number 1=785-1004-1-ND, Created By="Dylan T", FET Type=N-Channel, Manufacturer _Part_Number=AO3404A, Rds (on)="28mOhm @ 5.8A, 10V", SourceLibrary=ON_Semiconductor_2020-01-13, Supplier 1=Digi-Key, Vdss=30V, Vendor="Alpha & Omega Semiconductor Inc.", Vgs (Max)="3V @ 5.8A, 10V", Vgs (th)="3V @ 250µA"
U11: library part TSM500P02CX, "P-Channel 20 V 4.7A (Tc) 1.56W (Tc) Surface Mount SOT-23", Amp Rating="4.7 A", Package="TO-236-3, SC-59, SOT-23-3", Power Dissipation="1.56W (Tc)", Supplier Part Number 1=TSM500P02CXRFGCT-ND, Created By="Robert Pafford", FET Type=P-Channel, Manufacturer_Part_Number=TSM500P02CX, Rds (on)="50mOhm @ 3A, 4.5V", Supplier 1=Digi-Key, Vdss="20 V", Vendor="Taiwan Semiconductor Corporation", Vgs (Max)=±10V, Vgs (th)="800mV @ 250µA"

## Free pads (board coordinates)
  round 60 hole 120: 1(120,430) 1(120,3880) 1(3880,430) 1(3880,3880)
  rrect50% 200x25 hole 50 slot 250 at 0 deg: 1(400,1050) 1(800,1050) 1(1200,1050) 1(1600,1050) 1(2000,1050) 1(2400,1050) 1(2800,1050) 1(3200,1050) 1(3600,1050)

## Via types
v1: diameter 22, hole 10, Top Layer to Bottom Layer, 173 vias
v2: diameter 32, hole 20, Top Layer to Bottom Layer, 12 vias
v3: diameter 27, hole 15, Top Layer to Bottom Layer, 4 vias
v4: diameter 52, hole 30, Top Layer to Bottom Layer, 4 vias

## Nets (pads, with @x,y where several pads share a name; then routed paths per layer and width w, separated by ;. In a path a pad name is that pad's centre, name@x,y a point inside that pad or via, vN(x,y) a via of type N, cw(c..) or ccw(c..) an arc to the next point about the centre after c; other vN are vias at no path point)
3V3: C5.1 C6.1 C7.1 C8.1 J1.1 J1.2 J1.3 J1.43 J1.54 J1.55 J1.56 J2.1 J2.2 J3.1 J4.1 J4.2 J4.3 J4.43 J4.54 J4.55 J4.56 SB1.2 | length 10491.6
  Top Layer w10: J1.43 1950,410 2000,460 2000,750 J4.43
  Top Layer w15: J4.56 295,800 166.5,928.5 SB1.2 125,1215 100,1240 100,3555 295,3750 C6.1 1020,3750 v2(1165,3750) ; v2(1280,3750) 1281,3749 1316,3749 2700,2365 v2(3360,2365)
  Top Layer w30: J4.1 J4.2 ; J4.56 J4.55 ; v4(750,315) J4.2 ; J4.3 J4.2 ; J4.54 J4.55 ; J4.2 J4.55
  Bottom Layer w10: J4.3 900,650 1800,650 J4.43
  Bottom Layer w15: v2@1155,3750 v2(1280,3750) 1277.7,3747.7 1277.7,3547.7 J2.1 J2.2 ; v2(3360,2365) 3360,2325 3410,2275 C8.1 C7.1 J3.1
3V3_LVL: R2.2 R4.2 R6.2 R8.2 R10.2 R12.2 R14.2 R16.2 SB1.1 SB2.2 U1.1 U2.1 U3.1 U4.1 U5.1 U6.1 U7.1 U8.1 | length 3884.4
  Top Layer w8: SB1.1 v1(290,1215) ; v1(425,1315) 425,1345 390.42,1379.58 R2.2 298.42,1379.58 294.42,1375.58 U1.1 227,1375.58 200,1402.58 200,1766.08 227,1793.08 U8.1 294.42,1793.08 298.42,1797.08 R16.2 340,1725 405,1660 485,1660 500,1675 500,1734.02 510.98,1745 525,1745 541,1761 U7.1 594.42,1793.08 598.42,1797.08 R14.2 642.5,1797.08 689.58,1750 v1(695,1750) ; v3(541,1315) U2.1 594.42,1375.58 598.42,1379.58 R4.2 ; v1(840,1315) 841,1316 U3.1 894.42,1375.58 898.42,1379.58 R6.2 ; U6.1 894.42,1793.08 898.42,1797.08 R12.2 v1(940,1750) ; U5.1 1194.42,1793.08 1198.42,1797.08 R10.2 v1(1240,1745) ; R8.2 1198.42,1379.58 1194.42,1375.58 U4.1 1141,1336 v1(1120,1315) 1120,1270 1175,1215 SB2.2
  Bottom Layer w8: v1(290,1215) 370,1215 425,1270 v1(425,1315) v1(840,1315) v1(1120,1315) ; v1(695,1750) 794.57,1750 804.57,1740 926.21,1740 936.21,1750 v1(940,1750) 1235,1750 v1(1240,1745)
3V3_MCU: C3.1 C4.1 C9.1 C10.1 D2.1 J5.1 M1.36 M2.1 SB2.1 | length 7486.6
  Top Layer w8: SB2.1 1318.5,1343.5 v1(1340,1365)
  Top Layer w20: M2.1 445,3180 C10.1 C9.1@565,3180 ; C9.1 570,2486.72 581.72,2475 1070,2475 1260,2285 2885,2285 3070,2100 3070,1790 2930,1650 v2(2930,1505) 2932.3,1502.7 3062.3,1502.7 3134,1431 3180,1431 v2(3180.46,1430.54) ; v2(3340,1430) 3440,1430 3518.02,1351.98 M1.36 3518.02,1138.02 3445,1065 3445,1028.95 3465,1008.95 C4.1 C3.1 D2.1
  Bottom Layer w8: v1(1340,1365) J5.1
  Bottom Layer w20: J5.1 1530,1430 1605,1505 1885,1505 2060,1330 2805,1330 2930,1455 v2(2930,1505) ; v2(3180.46,1430.54) v2(3180.46,1430.54) 3339.5,1430.5 v2(3340,1430)
3V3_ON/OFF: J1.14 J4.14 | length 450
  Bottom Layer w10: J1.14 J4.14
5V: J1.11 J1.12 J1.13 J1.44 J1.45 J1.46 J4.11 J4.12 J4.13 J4.44 J4.45 J4.46 R1.1 R3.1 R5.1 R7.1 R9.1 R11.1 R13.1 R15.1 U11.2 | length 5631
  Top Layer w8: R1.1 233.5,1625 ; R15.1 233.5,1625 ; R3.1 533.5,1625 ; R13.1 533.5,1625 ; R5.1 833.5,1625 ; R11.1 833.5,1625 ; R7.1 1133.5,1625 ; R9.1 1133.5,1625 ; v1(1370,975) 1370,1570 1315,1625 1133.5,1625 ; 233.5,1625 533.5,1625 ; 533.5,1625 833.5,1625 ; 833.5,1625 861.93,1625 871.93,1615 997.71,1615 1007.71,1625 1133.5,1625
  Top Layer w15: v3(3680,680) 3683.25,680 3744.25,741 U11.2
  Top Layer w30: J4.11 J4.12 ; J4.46 J4.45 ; v4(1750,315) J4.12 ; J4.13 J4.12 ; J4.44 J4.45 ; J4.12 J4.45
  Bottom Layer w8: v1(1370,975) 1420,925 1525,925 J4.46
  Bottom Layer w15: J4.13 1902.39,652.39 3652.39,652.39 v3(3680,680)
5V_ON/OFF: J1.15 J2.4 J4.15 M1.20 | length 3825.8
  Top Layer w8: v1(2018.02,1830) v1(2018.02,2145) ; J4.15 v1(2050,690) ; v1(2070,1130) 2070,1424.64 2090,1444.64 2090,1445 2135,1490 v1(2135,1530)
  Bottom Layer w8: J2.4 2018.02,2601.98 v1(2018.02,2145) ; v1(2018.02,1830) 2135,1713.02 v1(2135,1530) ; J1.15 J4.15 ; v1(2050,690) 2050,725 2101.12,776.12 2101.12,848.88 2160,907.76 2160,1080 2110,1130 v1(2070,1130)
12V_ON/OFF: J1.16 J4.16 M1.7 | length 2719.6
  Top Layer w8: J4.16 v1(2150,690) ; v1(3300,1630) 3300,1632.14 3318.02,1650.16 M1.7
  Bottom Layer w8: v1(2150,690) 2770,690 2801.12,721.12 2801.12,831.12 2830,860 2875,860 3030,1015 3030,1090 3108.5,1168.5 3108.5,1438.5 v1(3300,1630)
  Bottom Layer w10: J1.16 J4.16
ACOUSTIC_ON/OFF: J1.17 J4.17 | length 450
  Bottom Layer w10: J1.17 J4.17
BOARD_SCL: J1.31 J2.16 J4.31 M1.32 | length 5913.2
  Top Layer w8: v1(3000.3,1345.3) 3000.6,1345 3035,1345 3104.72,1275.28 3104.72,1246.57 M1.32 ; 3118.65,1170.19 3118.65,1138.65 3055,1075 3055,995 3150,900 J4.31
  Top Layer w10: J1.31 3150,410 3200,460 3200,750 J4.31
  Bottom Layer w8: J2.16 525,3495 525,3605 720,3800 1505,3800 2556.5,2748.5 2556.5,2389.76 2709.76,2236.5 3024.76,2236.5 3126.5,2134.76 3126.5,1596.5 3000,1470 3000,1419.39 3000.3,1419.1 v1(3000.3,1345.3)
BOARD_SDA: J1.32 J2.15 J4.32 M1.31 | length 5601.7
  Top Layer w8: v1(2955,1345) 2955.14,1344.86 2955.14,1318.62 3018.02,1255.74 M1.31 ; 3018.65,1170.19 3018.65,971.35 3053.5,936.5 J4.32@3053.5,803.5
  Top Layer w10: J1.32 3050,410 3100,460 3100,750 J4.32 J4.32@3053.5,803.5
  Bottom Layer w8: J2.15 815,3785 1503.74,3785 2545,2743.74 2545,2385 2705,2225 3020,2225 3115,2130 3115,1601.26 2955,1441.26 v1(2955,1345)
ETH_CLK: M1.14 M2.6 | length 2571.5
  Top Layer w8: M2.6 555,2430 1045,2430 1230,2245 2496.05,2245 2618.02,2123.02 M1.14
ETH_CS: M1.17 M2.5 | length 2666.3
  Top Layer w8: M2.5 275,2610 275,2355 320,2310 1070,2310 1195,2185 2260,2185 2320,2125 2320,1998.23 M1.17
ETH_MISO: M1.16 M2.7 | length 2521.7
  Top Layer w8: M2.7 295,2430 295,2380 340,2335 1075,2335 1205,2205 2340,2205 2418.02,2126.98 M1.16
ETH_MOSI: M1.15 M2.8 | length 2388.9
  Top Layer w8: M2.8 1030,2410 1215,2225 2415,2225 2518.02,2121.98 M1.15@2518.02,1998.23 ; M1.15 M1.15@2520,1998.23
ETH_RST: M1.12 M2.3 | length 3050.4
  Top Layer w8: M2.3 495,2790 495,2530 575,2450 1060,2450 1245,2265 2680,2265 2818.02,2126.98 M1.12
FAULT_LED: M1.6 R21.2 | length 206.5
  Top Layer w8: R21.2@3415,2201.5 R21.2 M1.6
GND: C1.2 C2.2 C3.2 C4.2 C5.2 C6.2 C7.2 C8.2 C9.2 C10.2 C11.2 D1.2 J1.4 J1.5 J1.6 J1.8 J1.9 J1.10 J1.47 J1.48 J1.49 J1.51 J1.52 J1.53 J2.19 J2.20 J3.4 J4.4 J4.5 J4.6 J4.8 J4.9 J4.10 J4.47 J4.48 J4.49 J4.51 J4.52 J4.53 J5.4 M1.3 M1.8 M1.13 M1.18 M1.23 M1.28 M1.33 M1.38 M1.42 M2.2 pad.1@400,1050 R22.1 S1.3 S1.4 | length 15199.5
  Top Layer w10: v1(370,3825) D1.2
  Top Layer w20: 3774.75,1910 3945,1910 3970,1935 3970,2190 J3.4
  Top Layer w25: M2.2 300,3085 300,3250 ; v2(435,2255) 540,2150 635,2150 1366.26,2150 S1.4 S1.3 1978.67,1793.5 2156.8,1793.5 2170.98,1779.32 2219.64,1779.32 ; C9.2 C10.2 300,3250 ; C5.2 C6.2 510,3680 J2.19 J2.20 300,3370 300,3250 ; v2(1725,1455) 1725,1515 1824.76,1614.76 1850,1614.76 ; C11.2 1850,1614.76 ; M1.23 2227.24,1265.13 2227.24,1274.92 2219.64,1282.52 2219.64,1615 ; M1.18 2218.65,1995.63 2218.65,1893.01 2275.99,1835.67 ; M1.28 2719.64,1265.13 2719.64,1424.32 2770.99,1475.67 ; M1.13 2718.02,1835 2717.35,1835.67 ; M1.33 3218.02,1385 ; M1.8 3208.18,1956.89 3220,1945.07 3220,1653.02 3353.02,1520 ; R22.1 3545,835 3535,845 C3.2 C4.2 C1.2 ; M1.3@3715,2042.45 3718.02,2045.47 M1.3 3718.02,1966.73 3774.75,1910 3718.65,1853.9 3718.65,1520 ; C2.2 C1.2 ; 1850,1614.76 M1.42 2044.79,1614.76 2045.03,1615 2219.64,1615 ; 2219.64,1615 2219.64,1779.32 ; 2219.64,1779.32 2275.99,1835.67 ; 2275.99,1835.67 2717.35,1835.67 ; 2717.35,1835.67 2717.35,1529.31 2770.99,1475.67 ; 2770.99,1475.67 2885.99,1475.67 2976.66,1385 3218.02,1385 ; 3218.02,1385 3353.02,1520 ; 3353.02,1520 3718.65,1520 ; 3718.65,1520 3718.65,1233.89 M1.38 3718.02,1136.98 3760,1095 3760,1030 3730,1000 C1.2
  Top Layer w30: J4.4 J4.5 ; J4.53 J4.52 J4.51 1150,725 ; v4(1050,315) J4.5 ; v4(1450,315) J4.9 ; J4.10 J4.9 ; J4.47 J4.48 J4.49 1350,725 ; J4.5 J4.6 1150,725 ; 1150,725 1350,725 ; 1350,725 J4.8 J4.9
  Bottom Layer w10: v1(370,3825) 370,3550 J2.19
  Bottom Layer w15: C8.2 C7.2 3815,2345 J3.4
  Bottom Layer w25: M2.2 435,2950 v2(435,2255) ; J4.53@950,801.53 950,1005 1145,1200 1665,1200 J5.4 1818.25,1365 1728.25,1455 v2(1725,1455)
JETSON_ON/OFF: J1.18 J4.18 | length 450
  Bottom Layer w10: J1.18 J4.18
KILL_SWITCH: J1.37 J2.14 J4.37 M1.4 | length 6468.8
  Top Layer w8: J2.14 625.12,3494.88 625.12,3565.66 677.96,3618.5 1345.59,3618.5 2639.09,2325 3276.23,2325 3371.23,2230 3485,2230 3618.65,2096.35 3618.65,2006.1 v1(3618.65,1800)
  Top Layer w10: J1.37 2550,410 2600,460 2600,750 J4.37
  Bottom Layer w8: J4.37 2630,880 2870,880 3015,1025 3015,1100 3081.5,1166.5 3081.5,1451.5 3310,1680 3498.65,1680 v1(3618.65,1800)
MOBO_ON/OFF: J1.19 J2.6 J4.19 M1.22 | length 4410.2
  Top Layer w8: v1(1725,1930) 1726,1929 1806,1929 1970.68,1764.32 2121.89,1764.32 2136.21,1750 v1(2140,1750) ; M1.22 2118.02,1151.98 2140,1130 v1(2175,1130) v1(2175,1565) ; J4.19 v1(2450,720)
  Bottom Layer w8: J2.6 1075,2135 1150,2060 1210.36,2060 1260,2010.36 1436.78,2010.36 1517.13,1930 v1(1725,1930) ; v1(2140,1750) 2175,1715 v1(2175,1565) ; v1(2175,1130) 2220,1085 2220,1009.64 2398.88,830.76 2398.88,771.12 v1(2450,720) ; J1.19 J4.19
NetD1_1: D1.1 R21.1 | length 3646.8
  Top Layer w8: D1.1 1101.77,3880 2641.77,2340 3341,2340 3415.52,2265.48 R21.1
NetD2_2: D2.2 R22.2 | length 80.6
  Top Layer w15: D2.2 3505,730 3506.5,731.5 R22.2
PWM_1: J1.20 J4.20 R1.2 U1.3 | length 3592.3
  Top Layer w8: R1.2 166.5,1481.5 159,1474 U1.3 159,1316 195,1280 275,1280 333,1222 968,1222 990,1200 990,1005 1130,865 2470,865 2501.12,833.88 2501.12,779.75 2550,730.87 J4.20
  Bottom Layer w8: J1.20 J4.20
PWM_2: J1.21 J4.21 R3.2 U2.3 | length 3412.8
  Top Layer w8: R3.2 466.5,1481.5 459,1474 U2.3 459,1286 511.5,1233.5 981.5,1233.5 1010,1205 1010,1010 1135,885 2555,885 2601.12,838.88 2601.12,779.75 2650,730.87 J4.21
  Bottom Layer w8: J1.21 J4.21
PWM_3: J1.22 J4.22 R5.2 U3.3 | length 3212.8
  Top Layer w8: R5.2 766.5,1481.5 759,1474 U3.3 759,1296 810,1245 995,1245 1030,1210 1030,1015 1140,905 2645,905 2701.12,848.88 2701.12,779.75 2750,730.87 J4.22
  Bottom Layer w10: J1.22 J4.22
PWM_3V3_1: J2.12 M1.10 R2.1 U1.2 | length 5114.6
  Top Layer w8: U1.2 294.42,1450.58 298.42,1446.58 R2.1 340,1490 380,1530 v1(380,1560) ; v1(775,2506) J2.12 ; M1.10@3018.65,1996.26 3018.81,1996.1 3018.81,1886.19 v1(3020,1885)
  Bottom Layer w8: v1(380,1560) 378.5,1561.5 378.5,1870 ; v1(775,2506) 775,2365 378.5,1968.5 378.5,1870 ; v1(3020,1885) 2855,1885 2835,1905 1480,1905 1410,1975 505,1975 400,1870 378.5,1870
PWM_3V3_2: J2.13 M1.11 R4.1 U2.2 | length 5577.1
  Top Layer w8: v1(300,1595) v1(410,1595) 490,1595 500,1585 500,1477.58 527,1450.58 U2.2 594.42,1450.58 598.42,1446.58 R4.1 ; M1.11 2918.81,1995.47 2918.81,1856.19 v1(2920,1855)
  Bottom Layer w8: v1(300,1595) 300,1960 625,2285 625,3495 J2.13 ; v1(410,1595) 410,1635 390,1655 390,1835 505,1950 1400,1950 1465,1885 2820,1885 2850,1855 v1(2920,1855)
PWM_3V3_3: J2.10 M1.27 R6.1 U3.2 | length 5058.9
  Top Layer w8: U3.2 894.42,1450.58 898.42,1446.58 R6.1 940,1475 970,1505 v1(970,1540) ; v1(2585,1415) 2618.5,1381.5 2618.5,1233.74 M1.27
  Bottom Layer w8: J2.10 875,3010 745,2880 745,2356.26 355,1966.26 355,1520 370,1505 935,1505 v1(970,1540) 970,1615 1055,1700 1755,1700 2085,1370 2435,1370 2480,1415 v1(2585,1415)
PWM_3V3_4: J2.9 M1.26 R8.1 U4.2 | length 4950.2
  Top Layer w8: v1(1100,1495) 1116,1479 1116,1461.58 1127,1450.58 U4.2 1194.42,1450.58 1198.42,1446.58 R8.1 1240,1500 v1(1270,1530) ; M1.26 v1(2518.02,1383.02)
  Bottom Layer w8: J2.9 825,3495 825,2980 730,2885 730,2365 340,1975 340,1515 361.5,1493.5 939.76,1493.5 941.26,1495 v1(1100,1495) ; v1(1270,1530) 1270,1620 1330,1680 1745,1680 2075,1350 2455,1350 2488.02,1383.02 v1(2518.02,1383.02)
PWM_3V3_5: J2.7 M1.24 R10.1 U5.2 | length 3400.8
  Top Layer w8: U5.2 1194.42,1868.08 1198.42,1864.08 R10.1 1314.08,1864.08 v1(1315,1865) 1315,1920 1220,2015 v1(1175,2015) ; M1.24 2327.87,1272.63 2320,1280.5 v1(2320,1415)
  Bottom Layer w8: J2.7 1025,3495 1025,2165 v1(1175,2015) ; v1(1315,1865) 1420,1760 1803.38,1760 2148.38,1415 v1(2320,1415)
PWM_3V3_6: J2.5 M1.21 R12.1 U6.2 | length 3351.1
  Top Layer w8: U6.2 894.42,1868.08 898.42,1864.08 999.08,1864.08 v1(1000,1865) v1(1000,2050) ; v1(1000,2740) 1026.12,2766.12 1026.12,3496.12 J2.5 ; M1.21 2018.81,1234.05 2018.81,1413.81 v1(2065,1460)
  Bottom Layer w8: v1(1000,1865) 1045,1820 1320,1820 1400,1740 1785,1740 v1(2065,1460) ; v1(1000,2050) v1(1000,2740)
PWM_3V3_7: J2.3 M1.19 R14.1 U7.2 | length 3604.5
  Top Layer w8: U7.2 594.42,1868.08 598.42,1864.08 R14.1 679.08,1864.08 v1(705,1890) v1(705,2005) ; v1(975,2515) 975,2670 1123.88,2818.88 1123.88,3493.88 J2.3 ; v1(2065,1860) 2090,1860 2118.02,1888.02 M1.19
  Bottom Layer w8: v1(705,1890) 745,1930 1380,1930 1445,1865 1799.13,1865 1804.13,1860 v1(2065,1860) ; v1(705,2005) 705,2245 v1(975,2515)
PWM_3V3_8: J2.8 M1.25 R16.1 U8.2 | length 4453.9
  Top Layer w8: U8.2 294.42,1868.08 298.42,1864.08 R16.1 R16.1@342.5,1864.08 ; v1(415,1765) 415,1835 385.92,1864.08 R16.1@342.5,1864.08 ; v1(485,2035) 362.5,1912.5 362.5,1884.08 R16.1@342.5,1864.08 ; M1.25 2418.81,1234.05 2418.81,1413.81 v1(2420,1415)
  Bottom Layer w8: v1(415,1765) 460,1720 1764.64,1720 2054.64,1430 2055,1430 2095,1390 2350,1390 2375,1415 v1(2420,1415) ; v1(485,2035) 693.5,2243.5 693.5,2249.76 925,2481.26 925,3395 J2.8
PWM_4: J1.23 J4.23 R7.2 U4.3 | length 3092.5
  Top Layer w8: U4.3@1059,1423.08 1059,1339 1050,1330 1050,1020 1145,925 2760,925 2800.12,884.88 2800.12,779.34 2850,729.46 J4.23 ; 1059,1424.08 1059,1474 1066.5,1481.5 R7.2
  Bottom Layer w10: J1.23 J4.23
PWM_5: J1.24 J4.24 R9.2 U5.3 | length 3878.1
  Top Layer w8: R9.2 1066.5,1768.5 1059,1776 U5.3 1059,1984 1125,2050 1220.36,2050 1390,1880.36 1390,1005 1450,945 2800,945 2901.12,843.88 2901.12,779.75 2950,730.87 J4.24
  Bottom Layer w8: J1.24 J4.24
PWM_6: J1.25 J4.25 R11.2 U6.3 | length 4283.9
  Top Layer w8: R11.2 766.5,1768.5 759,1776 U6.3 759,1954 880,2075 1215,2075 1405,1885 1405,1025 1465,965 2900,965 2970,895 2970,850 3001.12,818.88 3001.12,779.75 3050,730.87 J4.25
  Bottom Layer w8: J1.25 J4.25
PWM_7: J1.26 J4.26 R13.2 U7.3 | length 4716.4
  Top Layer w8: R13.2 466.5,1768.5 459,1776 U7.3 459,1969 576.5,2086.5 1233.5,2086.5 1420,1900 1420,1040 1475,985 2915,985 3001.12,898.88 v1(3001.12,868.88) ; J4.26 v3(3150,700)
  Bottom Layer w8: v1(3001.12,868.88) 3001.12,779.75 3029.75,751.12 3118.88,751.12 3149.97,720.03 v3(3150,700) ; J1.26 J4.26
PWM_8: J1.27 J4.27 R15.2 U8.3 | length 5098.7
  Top Layer w8: R15.2 166.5,1768.5 159,1776 U8.3 159,1984 273,2098 1241.64,2098 1435,1904.64 1435,1054.9 1484.9,1005 2925,1005 3024.91,905.09 v1(3025.34,905.09) ; J4.27 v3(3250,700)
  Bottom Layer w8: v1(3025.34,905.09) 3025.42,905 3133.01,905 3198.88,839.13 3198.88,751.12 v3(3250,700) ; J1.27 J4.27
PWM_9: J1.33 J2.17 J4.33 M1.34 | length 6706.5
  Top Layer w8: v1(2845,940) 2945.8,839.2 2945.8,804.2 J4.33 ; 3318.65,1170.19 3318.65,1121.35 3350,1090 v1(3350,975)
  Top Layer w10: J1.33 2950,410 3000,460 3000,750 J4.33
  Bottom Layer w8: J2.17 475,3650 645,3820 1515,3820 2580,2755 2580,2400 2720,2260 3050,2260 3150,2160 3150,1585 3040,1475 3040,1349.64 3020.36,1330 2970,1279.64 2970,1040 2921.29,991.29 2896.29,991.29 v1(2845,940) ; J4.33 2950,875 3050,975 v1(3350,975)
PWM_10: J1.34 J4.34 M1.9 | length 2063.9
  Top Layer w8: M1.9 3118.02,1891.98 3195,1815 v1(3195,1485)
  Top Layer w10: J1.34 2850,410 2900,460 2900,750 J4.34
  Bottom Layer w8: J4.34 3045,995 3045,1082 3120,1157 3120,1412.5 3192.5,1485 v1(3195,1485)
RUN: C11.1 M1.30 S1.1 S1.2 | length 1823.5
  Top Layer w8: S1.1 1845,1750 C11.1 ; v1(2805,1440) 2865,1440 2920,1385 2920,1235.24 M1.30
  Bottom Layer w8: S1.2 S1.1 2155,1440 v1(2805,1440)
SENSOR_SCL: J1.29 J3.3 J4.29 M1.2 | length 2811.8
  Top Layer w10: J1.29 3350,410 3400,460 3400,750 J4.29 ; J3.3 3818.02,2241.98 M1.2
  Bottom Layer w10: J4.29 3645,800 3785,940 J3.3
SENSOR_SDA: J1.30 J3.2 J4.30 M1.1 | length 3082.2
  Top Layer w8: J3.2 3733.88,2323.88 3805.25,2323.88 3833.88,2295.25 3833.88,2256.12 3918.02,2171.98 M1.1
  Top Layer w10: J1.30 3250,410 3300,460 3300,750 J4.30
  Bottom Layer w10: J4.30 3345,895 3630,895 3750,1015 3750,2210 J3.2
SPARE1: J1.7 J4.7 | length 450
  Bottom Layer w10: J1.7 J4.7
SPARE2: J1.28 J4.28 | length 450
  Bottom Layer w10: J1.28 J4.28
SPARE5: J1.35 J4.35 | length 691.4
  Top Layer w10: J1.35 2750,410 2800,460 2800,750 J4.35
SPARE6: J1.36 J4.36 | length 691.4
  Top Layer w10: J1.36 2650,410 2700,460 2700,750 J4.36
SPARE8: J1.50 J2.11 J4.50 M1.29 | length 5670.4
  Top Layer w8: v1(1270,2105) 1472.5,1902.5 1472.5,1272.5 1595,1150 v1(1595,1100) 2785,1100 2820,1135 2820,1179.21 M1.29
  Top Layer w10: J1.50 1250,410 1300,460 v1(1300,685)
  Bottom Layer w8: J2.11 824.88,3594.88 1095.66,3594.88 1124.88,3565.66 1124.88,2135.12 1155,2105 v1(1270,2105)
  Bottom Layer w10: v1(1300,685) 1300,750 J4.50 1250,905 1445,1100 v1(1595,1100)
SWCLK: J5.2 M1.41 | length 639.3
  Top Layer w8: J5.2 1630,1585 1759.76,1714.76 M1.41
SWDIO: J5.3 M1.43 | length 327.6
  Top Layer w8: J5.3 1879.76,1514.76 M1.43
SWITCH_1: J1.38 J2.18 J4.38 M1.5 | length 6663.8
  Top Layer w8: J2.18 524.88,3395.12 695.66,3395.12 725,3424.46 725,3575 755,3605 1340,3605 2635,2310 3210,2310 3370,2150 3370,1940 3425,1885 3520,1885 ; M1.5 3508.18,1956.89 3520,1945.07 3520,1885 ; v1(3520,1795) 3520,1885
  Top Layer w10: J1.38 2450,410 2500,460 2500,750 J4.38
  Bottom Layer w8: J4.38 2546.5,896.5 2863.02,896.5 3000,1033.48 3000,1110 3055,1165 3055,1322.22 3070,1337.22 3070,1456.26 3318.74,1705 3430,1705 v1(3520,1795)
SWITCH_2: J1.39 J4.39 | length 691.4
  Top Layer w10: J1.39 2350,410 2400,460 2400,750 J4.39
SWITCH_3: J1.40 J4.40 | length 691.4
  Top Layer w10: J1.40 2250,410 2300,460 2300,750 J4.40
SWITCH_4: J1.41 J4.41 | length 691.4
  Top Layer w10: J1.41 2150,410 2200,460 2200,750 J4.41
SWITCH_5: J1.42 J4.42 | length 691.4
  Top Layer w10: J1.42 2050,410 2100,460 2100,750 J4.42
VBUS: M1.40 U11.1 | length 519.9
  Top Layer w15: U11.1 3857.5,1032.81 3854.43,1035.88 3854.43,1084.43 3918.02,1148.02 M1.40
VSYS: C1.1 C2.1 M1.39 U11.3 | length 590
  Top Layer w15: M1.39 3818.02,1128.02 3800,1110 C1.1 C2.1 3800,827.44 3820,807.44 U11.3
pads on no net: M1.35 M1.37 M1.44 M1.45 M1.46 M1.47 M1.48 M1.49 M2.4 M2.H1 M2.H2
copper on no net:
  other v1: 40,350 220,350 310,350 400,350 490,350 3510,350 3600,350 3690,350 3780,350 3960,350 40,530 3960,530 40,620 3960,620 40,710 3960,710 40,800 3960,800 40,890 3960,890 40,980 3960,980 40,1070 3960,1070 40,1160 40,1250 40,1340 40,1430 40,1520 40,1610 40,1700 40,1790 40,1880 40,1970 40,2060 40,2150 40,2240 40,2330 40,2420 2660,2460 40,2510 2660,2540 40,2600 2660,2630 40,2690 2660,2720 40,2780 2660,2810 40,2870 2660,2900 40,2960 2660,2990 40,3050 2660,3080 40,3140 2660,3170 40,3230 2660,3260 40,3320 2660,3350 40,3410 2660,3440 40,3500 3960,3505 40,3590 3960,3595 40,3680 3960,3685 40,3770 3960,3775 40,3960 200,3960 290,3960 380,3960 470,3960 560,3960 650,3960 740,3960 830,3960 920,3960 1010,3960 1100,3960 1190,3960 1280,3960 1370,3960 1460,3960 1550,3960 1640,3960 1730,3960 1820,3960 1910,3960 2000,3960 2090,3960 2180,3960 2270,3960 2360,3960 2450,3960 2540,3960 2630,3960 2720,3960 2810,3960 2900,3960 2990,3960 3080,3960 3170,3960 3260,3960 3350,3960 3440,3960 3530,3960 3620,3960 3710,3960 3820,3960 3960,3960
  other v2: 3950,1345 3950,1495 3950,1730 3950,1865

## Polygon pours and split planes (outlines as drawn)
GND on Bottom Layer "BOTTOM_GND_PLANE" (solid, pour order 13): 557,0 557,310 0,310 0,4000 4000,4000 4000,3465 2700,3465 2700,2425 4000,2425 4000,310 3443,310 3443,0
3V3 on Bottom Layer "PolygonDirect" (solid, pour order 0): 625,75 625,300 675,350 825,350 875,300 875,75
5V on Bottom Layer "PolygonDirect" (solid, pour order 6): 1625,75 1625,300 1675,350 1825,350 1875,300 1875,75
GND on Bottom Layer "PolygonDirect" (solid, pour order 4): 1325,75 1325,300 1375,350 1525,350 1575,300 1575,75
GND on Bottom Layer "PolygonDirect" (solid, pour order 3): 925,75 925,300 975,350 1125,350 1175,300 1175,75
GND on Top Layer "TOP_GND_PLANE" (solid, pour order 12): 557,0 557,310 0,310 0,4000 4000,4000 4000,3465 2700,3465 2700,2425 4000,2425 4000,310 3443,310 3443,0
3V3 on Top Layer "PolygonDirect" (solid, pour order 1): 625,75 625,300 675,350 825,350 875,300 875,75
5V on Top Layer "PolygonDirect" (solid, pour order 7): 1625,75 1625,300 1675,350 1825,350 1875,300 1875,75
GND on Top Layer "PolygonDirect" (solid, pour order 5): 1325,75 1325,300 1375,350 1525,350 1575,300 1575,75
GND on Top Layer "PolygonDirect" (solid, pour order 2): 925,75 925,300 975,350 1125,350 1175,300 1175,75

## Keep-outs
Keep-Out Layer:
  lines w6: 0,310 0,4000 4000,4000 4000,3465 2700,3465 2700,2425 4000,2425 4000,310 3443,310 3443,0 557,0 557,310 0,310 ; 300,1027.5 cw(c300,1050) 300,1072.5 500,1072.5 cw(c500,1050) 500,1027.5 300,1027.5 ; 700,1027.5 cw(c700,1050) 700,1072.5 900,1072.5 cw(c900,1050) 900,1027.5 700,1027.5 ; 1100,1027.5 cw(c1100,1050) 1100,1072.5 1300,1072.5 cw(c1300,1050) 1300,1027.5 1100,1027.5 ; 1500,1027.5 cw(c1500,1050) 1500,1072.5 1700,1072.5 cw(c1700,1050) 1700,1027.5 1500,1027.5 ; 1900,1027.5 cw(c1900,1050) 1900,1072.5 2100,1072.5 cw(c2100,1050) 2100,1027.5 1900,1027.5 ; 2300,1027.5 cw(c2300,1050) 2300,1072.5 2500,1072.5 cw(c2500,1050) 2500,1027.5 2300,1027.5 ; 2700,1027.5 cw(c2700,1050) 2700,1072.5 2900,1072.5 cw(c2900,1050) 2900,1027.5 2700,1027.5 ; 3100,1027.5 cw(c3100,1050) 3100,1072.5 3300,1072.5 cw(c3300,1050) 3300,1027.5 3100,1027.5 ; 3500,1027.5 cw(c3500,1050) 3500,1072.5 3700,1072.5 cw(c3700,1050) 3700,1027.5 3500,1027.5

## Silkscreen, mask and mechanical layers (free items; w line width, h text height)
Top Overlay:
  drawing of 19 lines, arcs and shapes, not listed
  text "The Underwater Robotics Team" at 2000,3760 h60
  text "'.ProjectTitle'" at 2000,3654.99 h60
Bottom Overlay:
  text "3V3" at 3604.99,2210 h30 r90
  text "SDA" at 3704.99,2210 h30 r90
  text "SCL" at 3804.99,2210 h30 r90
  text "GND" at 3904.99,2210 h30 r90

## Text inside footprints (layer, text, board x,y; h text height)
J2: Bottom Overlay "1" at 1334,3586 h30 r180
J3: Bottom Overlay "1" at 3525,2295 h30
J4: Top Overlay "28" at 3320.01,640 h30; Top Overlay "25" at 3020.01,640 h30; Top Overlay "49" at 1320.01,720.01 h30; Top Overlay "45" at 1720.01,720.01 h30; Top Overlay "10" at 1522.51,640 h30; Top Overlay "8" at 1335,640 h30; Top Overlay "32" at 3020.01,720.01 h30; Top Overlay "17" at 2222.51,640 h30; Top Overlay "51" at 1125.01,720.01 h30; Top Overlay "9" at 1435,640 h30; Top Overlay "26" at 3120.01,640 h30; Top Overlay "23" at 2820.01,640 h30; Top Overlay "1" at 640,640 h30; Top Overlay "3" at 835,640 h30; Top Overlay "38" at 2420.01,720.01 h30; Top Overlay "11" at 1627.51,640 h30; Top Overlay "52" at 1020.01,720.01 h30; Top Overlay "56" at 620.01,720.01 h30; Top Overlay "50" at 1220.01,720.01 h30; Top Overlay "15" at 2022.51,640 h30; Top Overlay "24" at 2920.01,640 h30; Top Overlay "20" at 2520.01,640 h30; Top Overlay "53" at 920.01,720.01 h30; Top Overlay "34" at 2820.01,720.01 h30; Top Overlay "44" at 1820.01,720.01 h30; Top Overlay "27" at 3220.01,640 h30; Top Overlay "41" at 2122.51,720.01 h30; Top Overlay "21" at 2625.01,640 h30; Top Overlay "40" at 2220.01,720.01 h30; Top Overlay "36" at 2620.01,720.01 h30; Top Overlay "4" at 935,640 h30; Top Overlay "13" at 1822.51,640 h30; Top Overlay "7" at 1235,640 h30; Top Overlay "29" at 3320.01,720.01 h30; Top Overlay "43" at 1920.01,720.01 h30; Top Overlay "42" at 2020.01,720.01 h30; Top Overlay "6" at 1135,640 h30; Top Overlay "16" at 2122.51,640 h30; Top Overlay "37" at 2520.01,720.01 h30; Top Overlay "30" at 3220.01,720.01 h30; Top Overlay "5" at 1035,640 h30; Top Overlay "55" at 720.01,720.01 h30; Top Overlay "39" at 2320.01,720.01 h30; Top Overlay "47" at 1520.01,720.01 h30; Top Overlay "19" at 2422.51,640 h30; Top Overlay "12" at 1722.51,640 h30; Top Overlay "48" at 1420.01,720.01 h30; Top Overlay "14" at 1922.51,640 h30; Top Overlay "18" at 2322.51,640 h30; Top Overlay "31" at 3120.01,720.01 h30; Top Overlay "54" at 820.01,720.01 h30; Top Overlay "2" at 735,640 h30; Top Overlay "35" at 2720.01,720.01 h30; Top Overlay "22" at 2720.01,640 h30; Top Overlay "46" at 1620.01,720.01 h30; Top Overlay "33" at 2920.01,720.01 h30
J5: Top Overlay "1" at 1460,1385 h30
M2: Top Overlay "1" at 395,3180 h30 r270; Top Overlay "CS" at 480.02,2695 h30; Top Overlay "INT" at 480.02,2795 h30; Top Overlay "GND" at 480.02,2995 h30; Top Overlay "RST" at 480.02,2895 h30; Top Overlay "VCC" at 480.02,3095 h30; Top Overlay "MOSI" at 480.02,2395 h30; Top Overlay "MISO" at 480.02,2495 h30; Top Overlay "SCLK" at 480.02,2595 h30